# Altium PCB IT_SENSOR_PCB.PcbDoc (part 1 of 2)
Units mm, origin at the board's own origin, x right, y up, seen from the top; angles counter-clockwise.
Board outline 100 x 100 mm, 4 copper layers (Top Layer, GND, POWER, Bottom Layer), stack 1.576 mm thick; 106 components, 76 nets, 394 pads, 164 vias.
Unrouted connection lines stored in the file: 43.
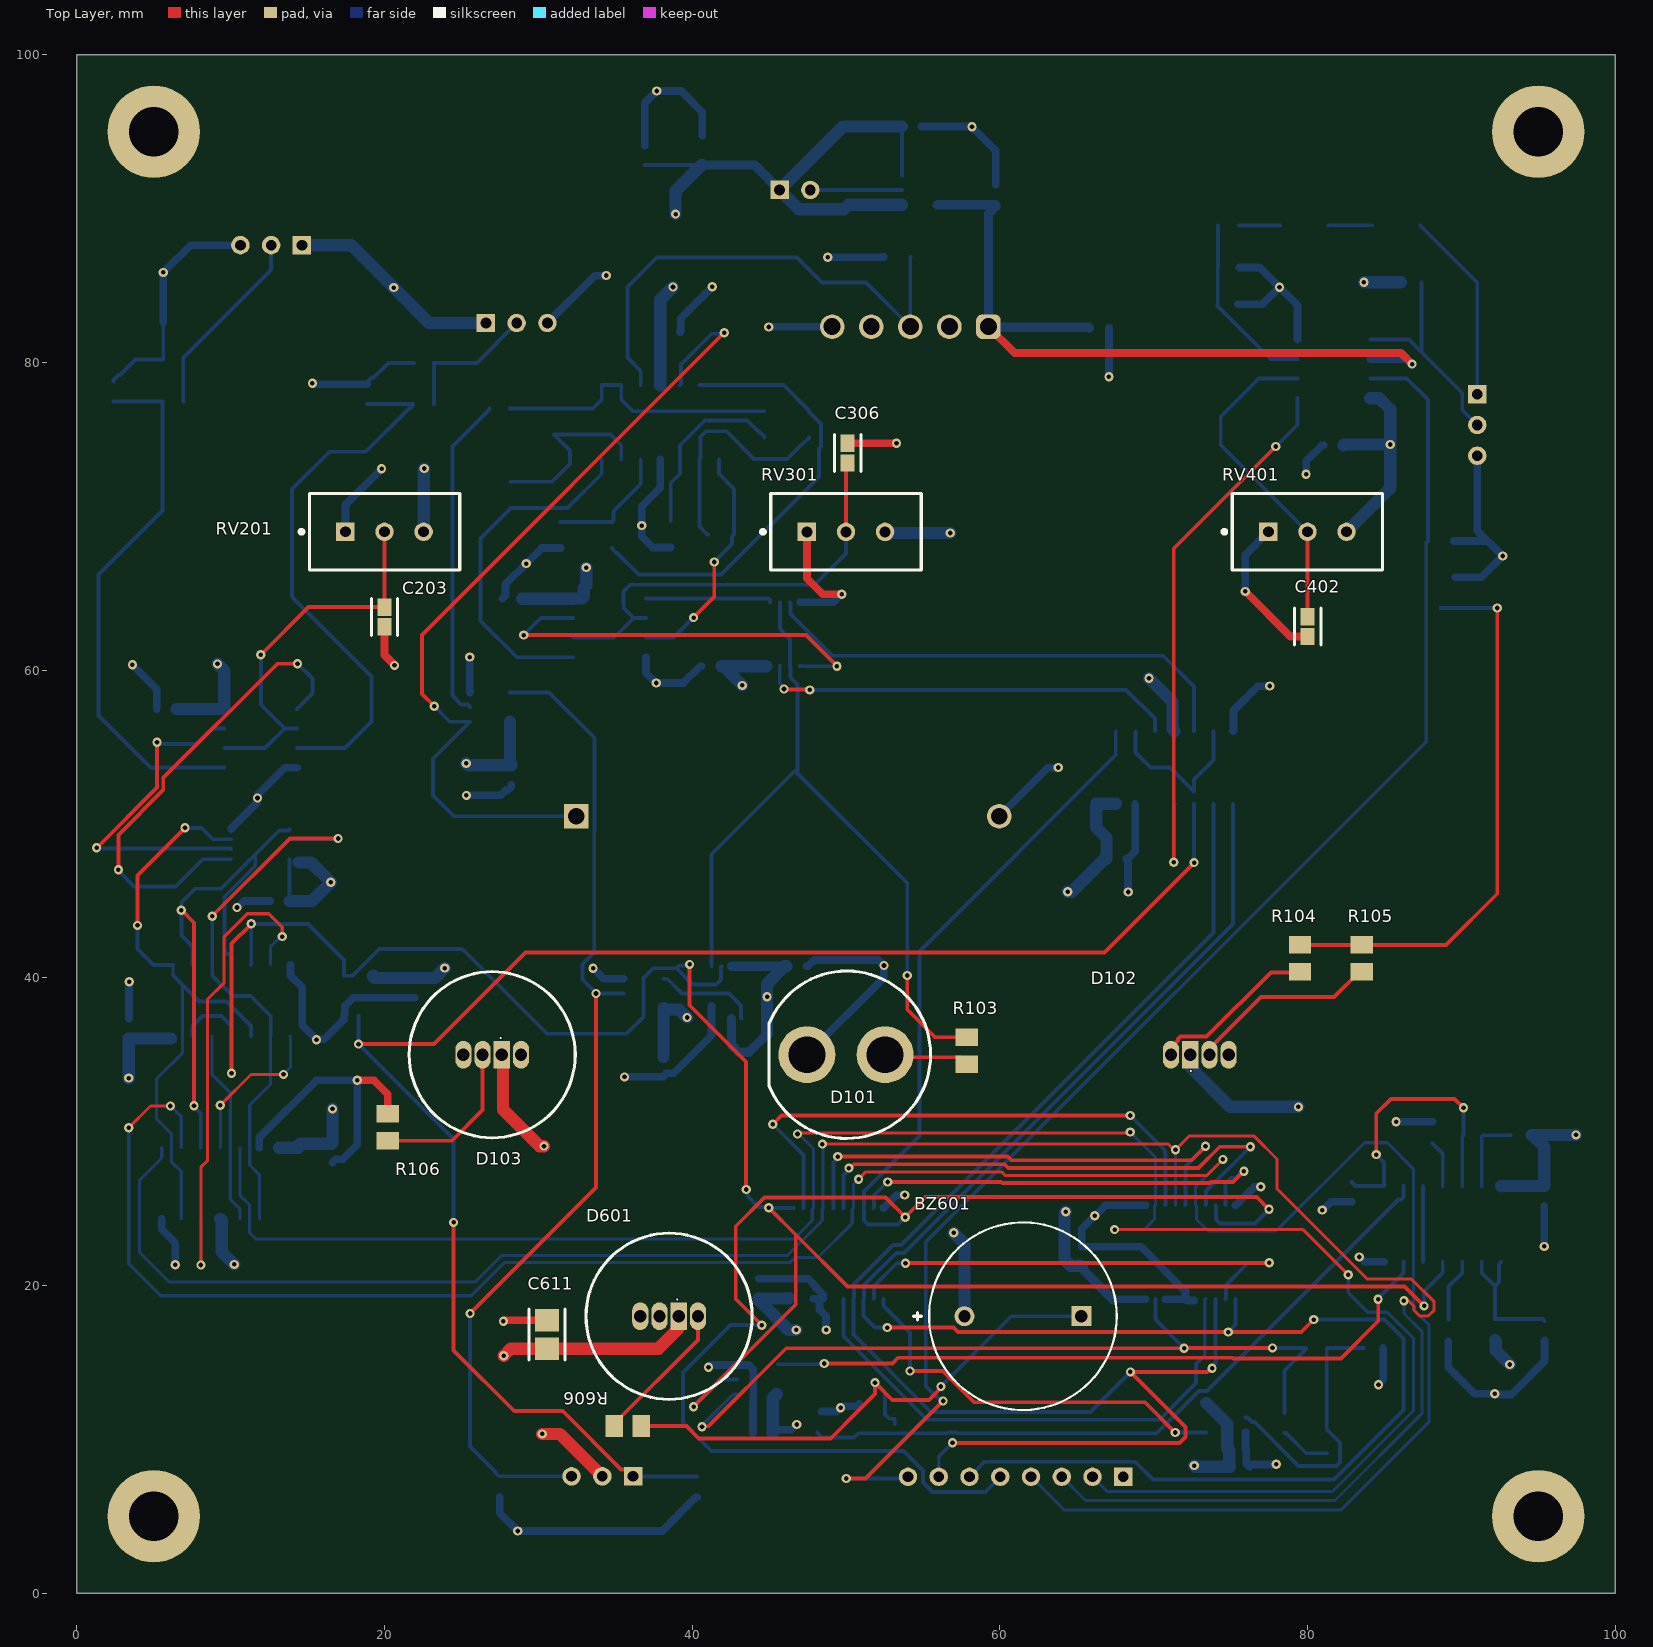
[diagram p0: Top Layer view]
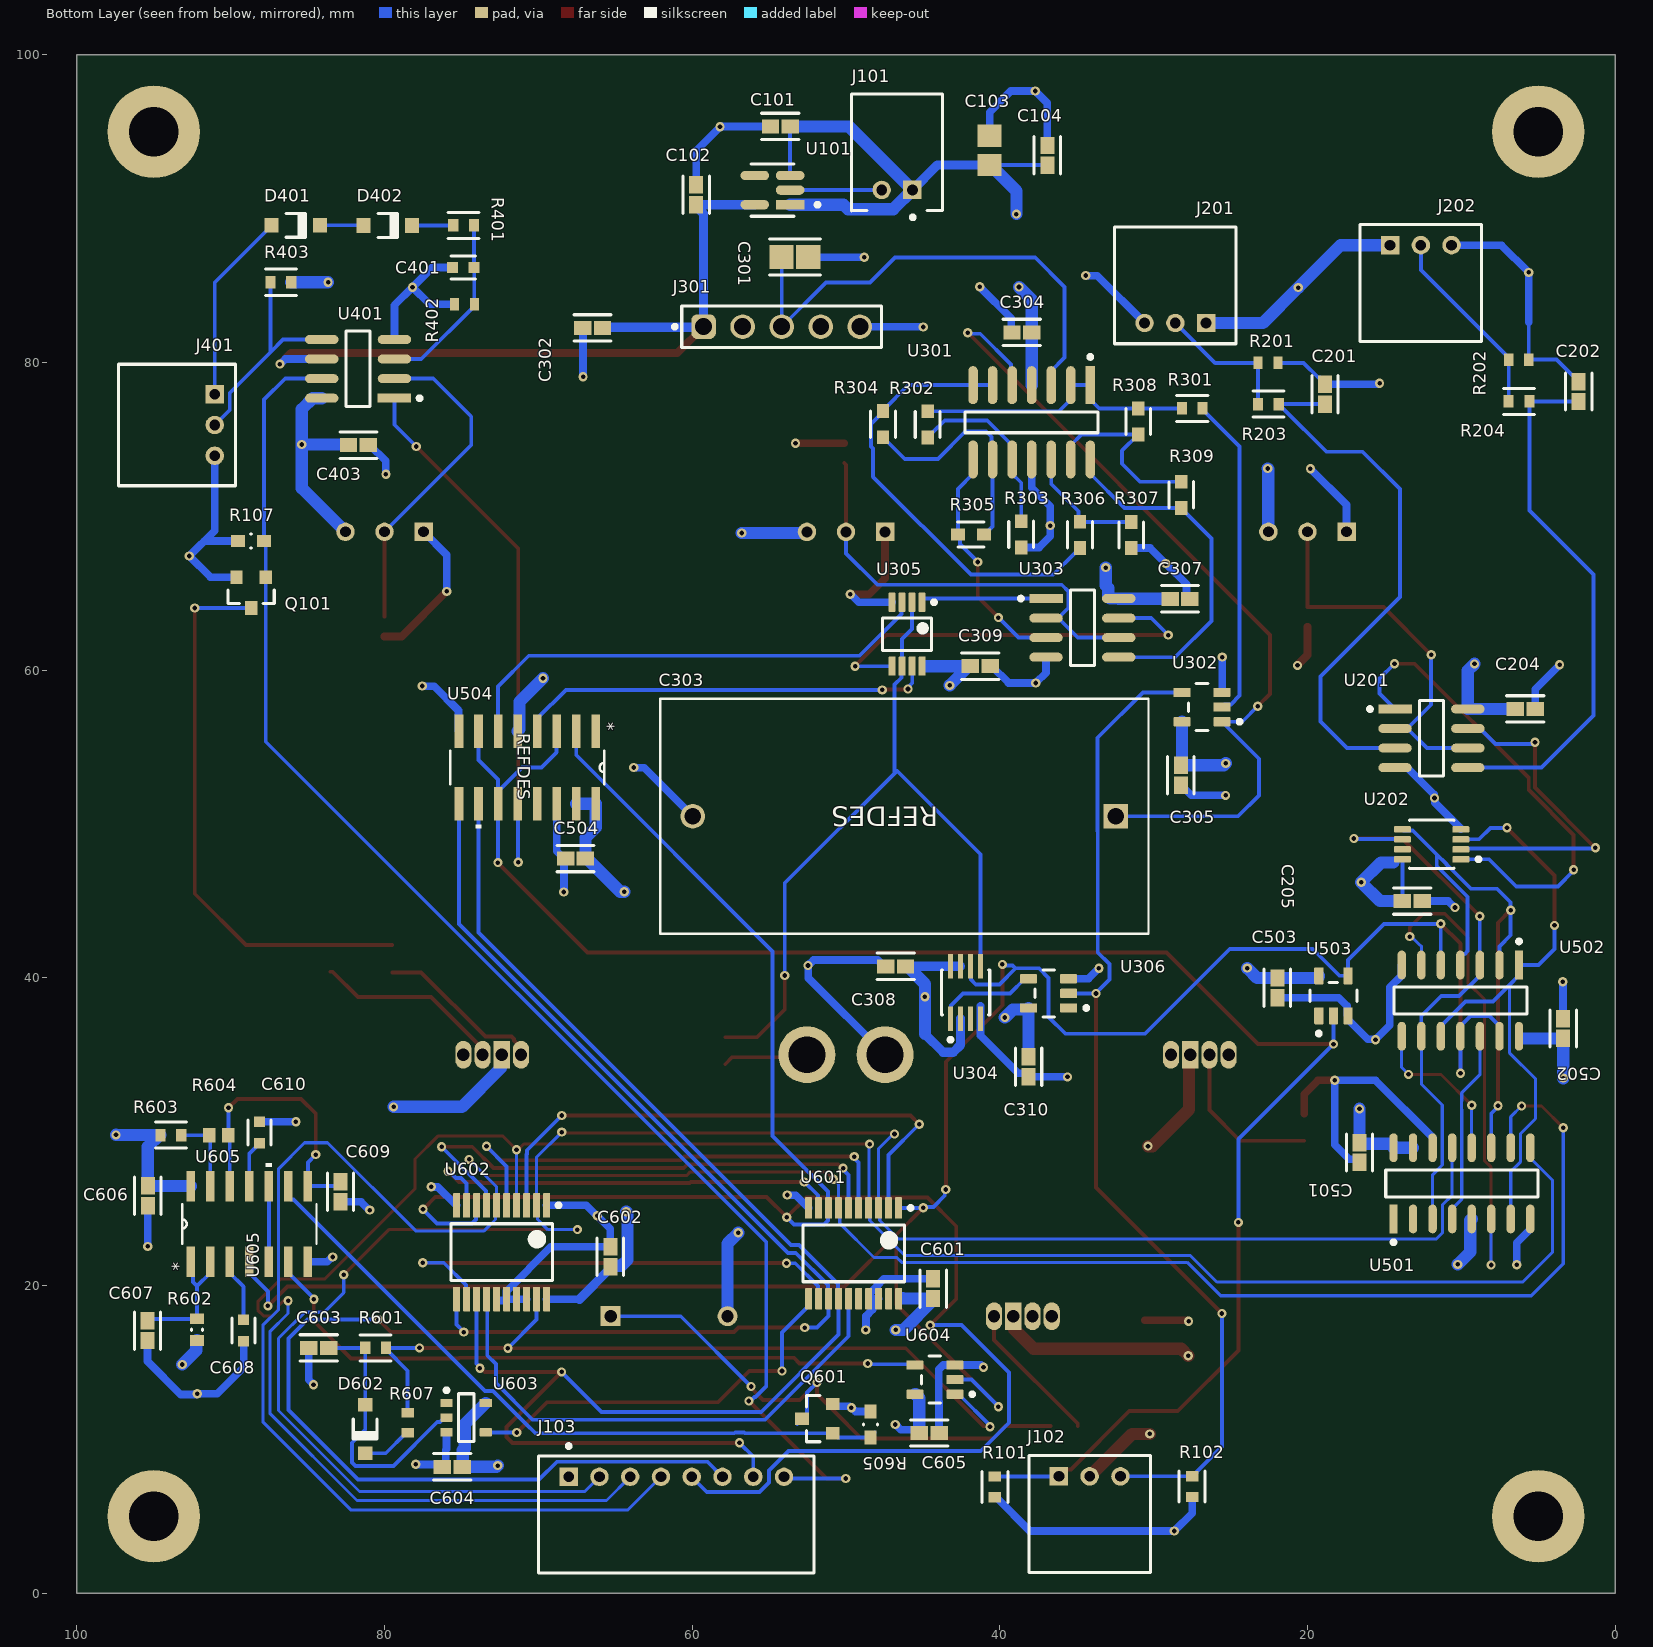
[diagram p1: Bottom Layer view, seen from below]
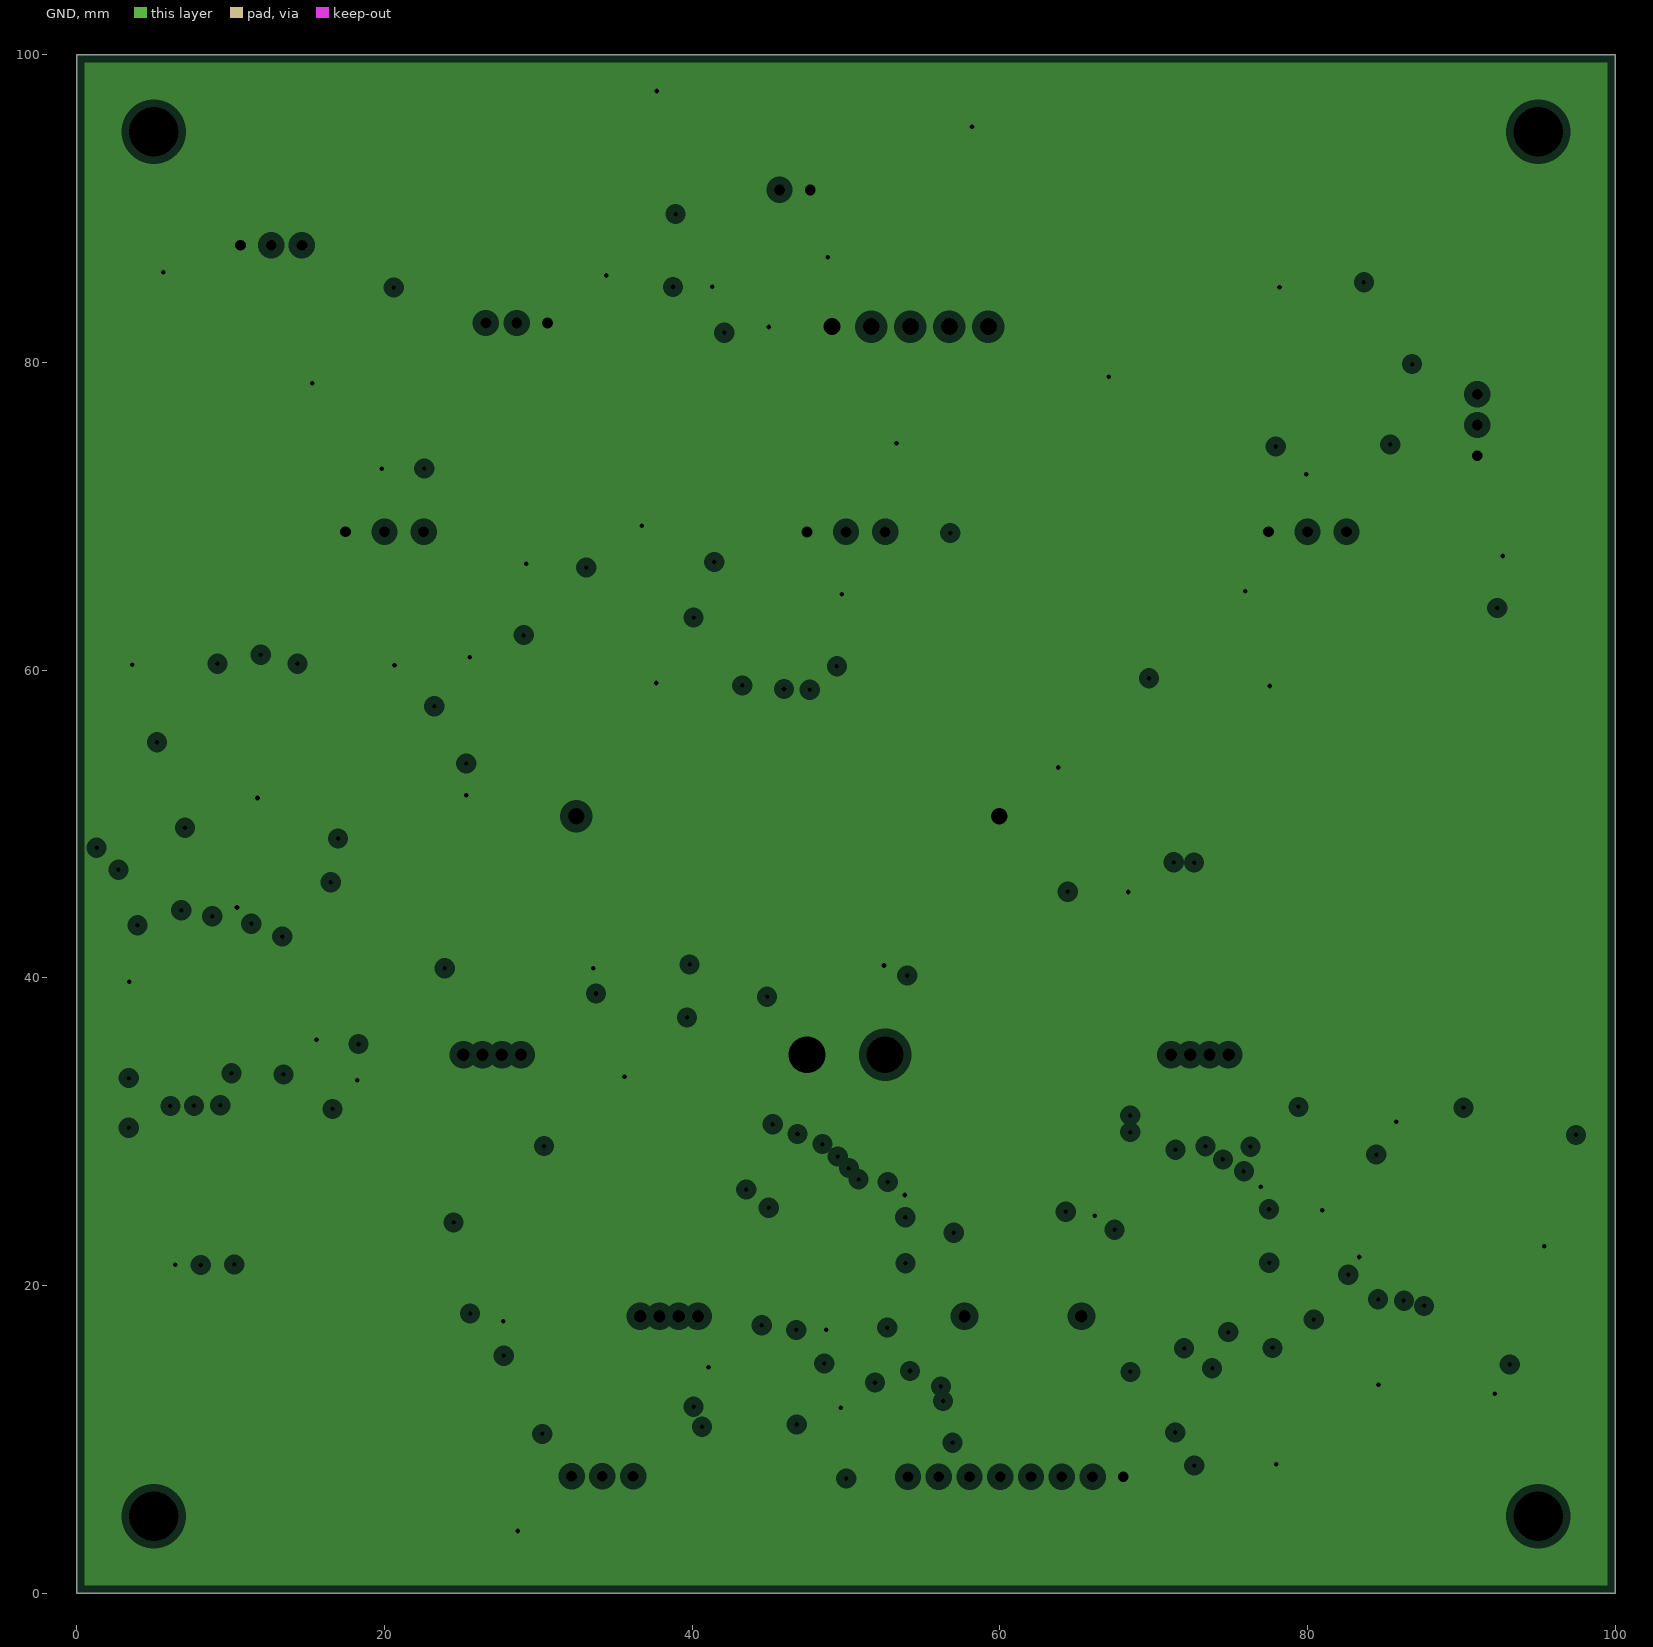
[diagram p2: GND, clearances drawn from the general rule]
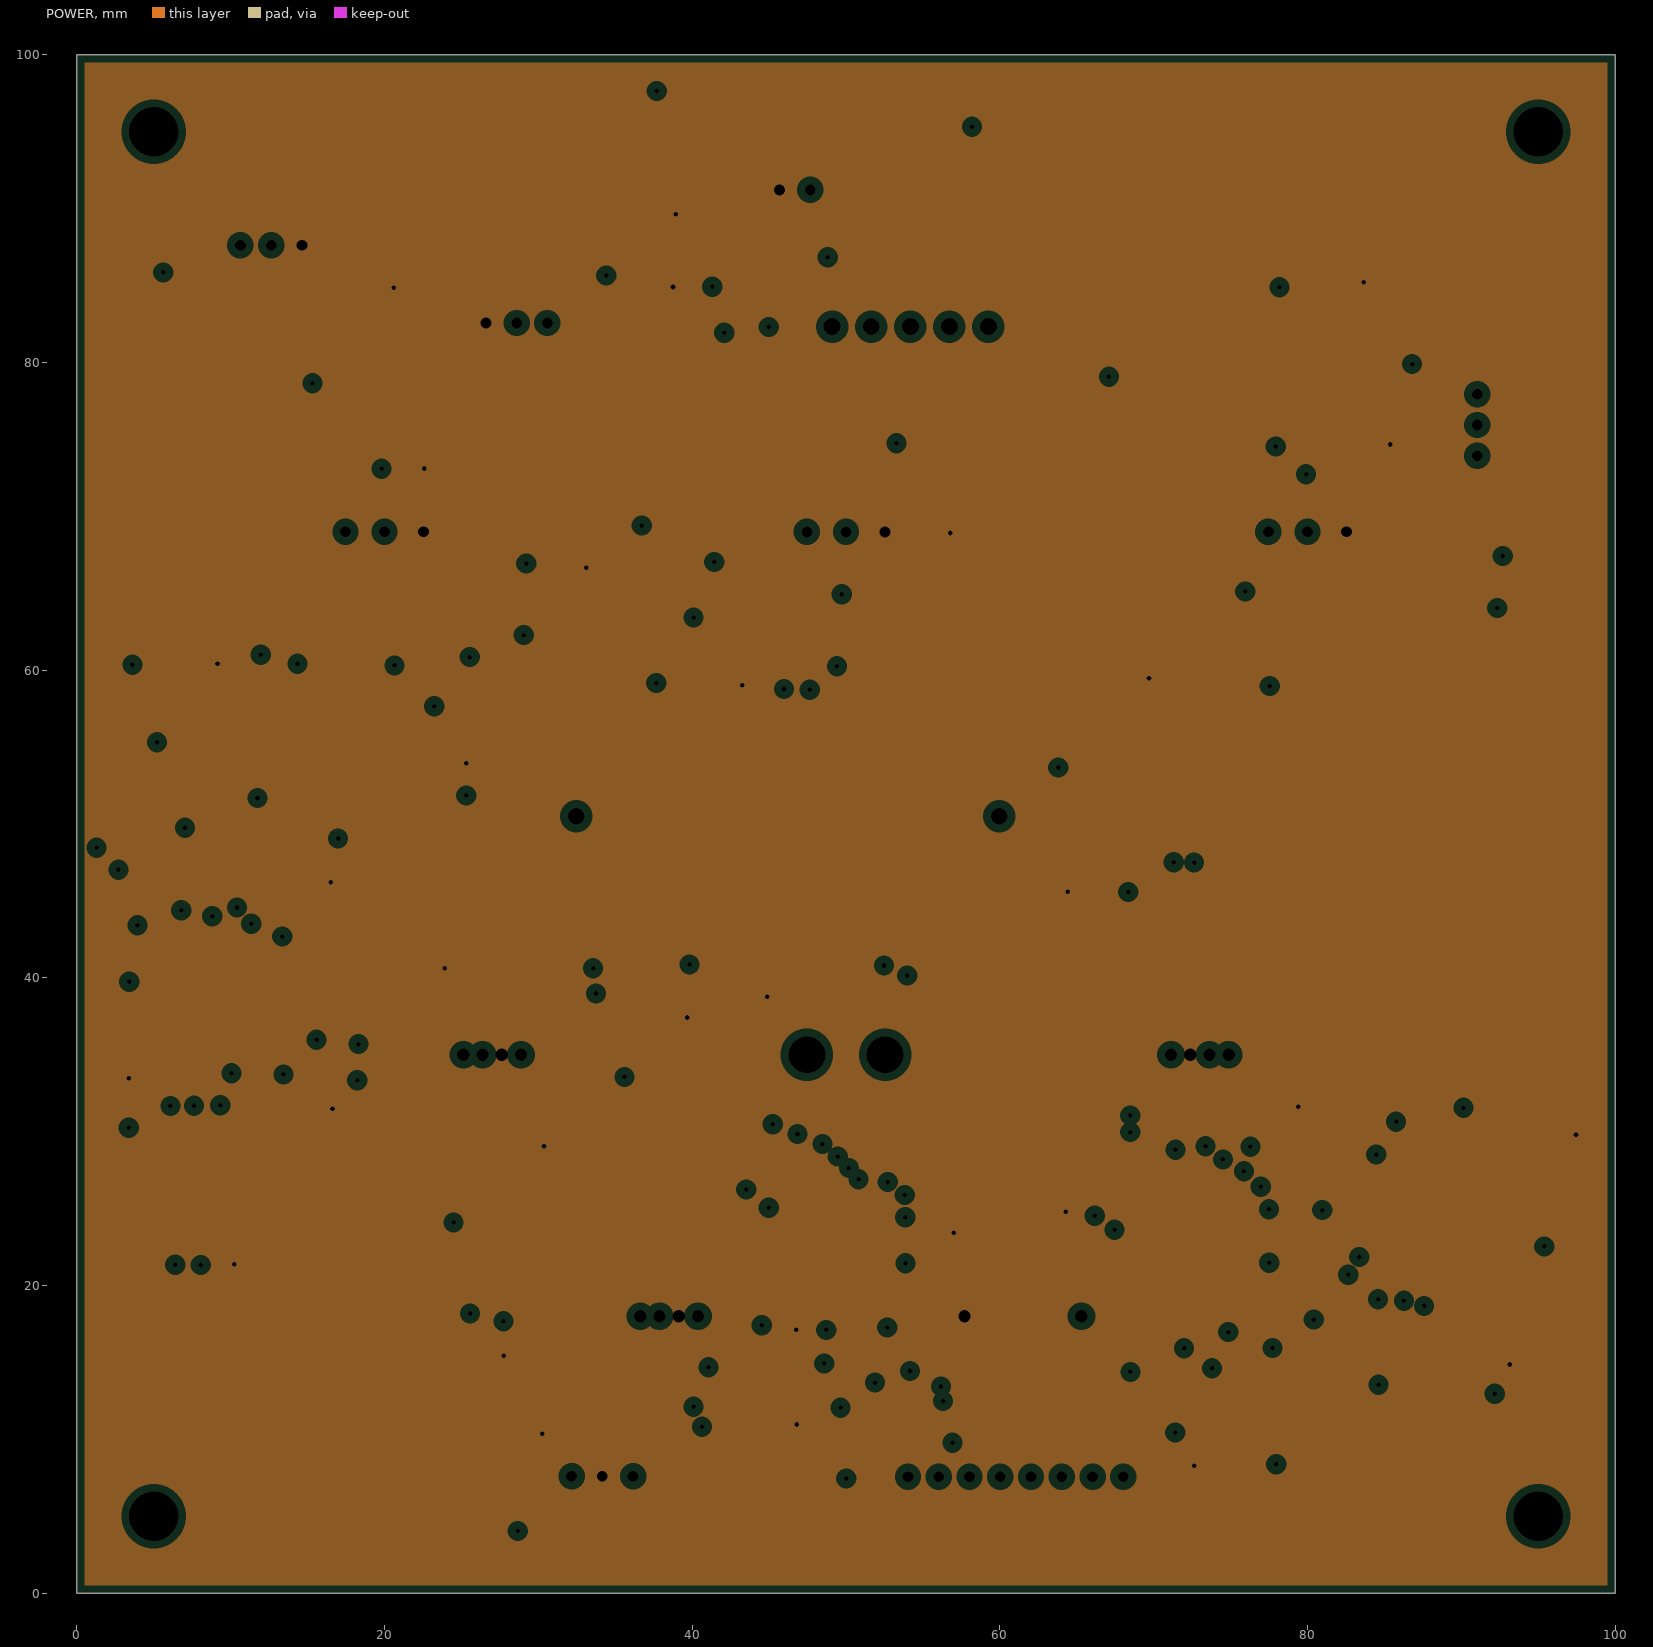
[diagram p3: POWER, clearances drawn from the general rule]
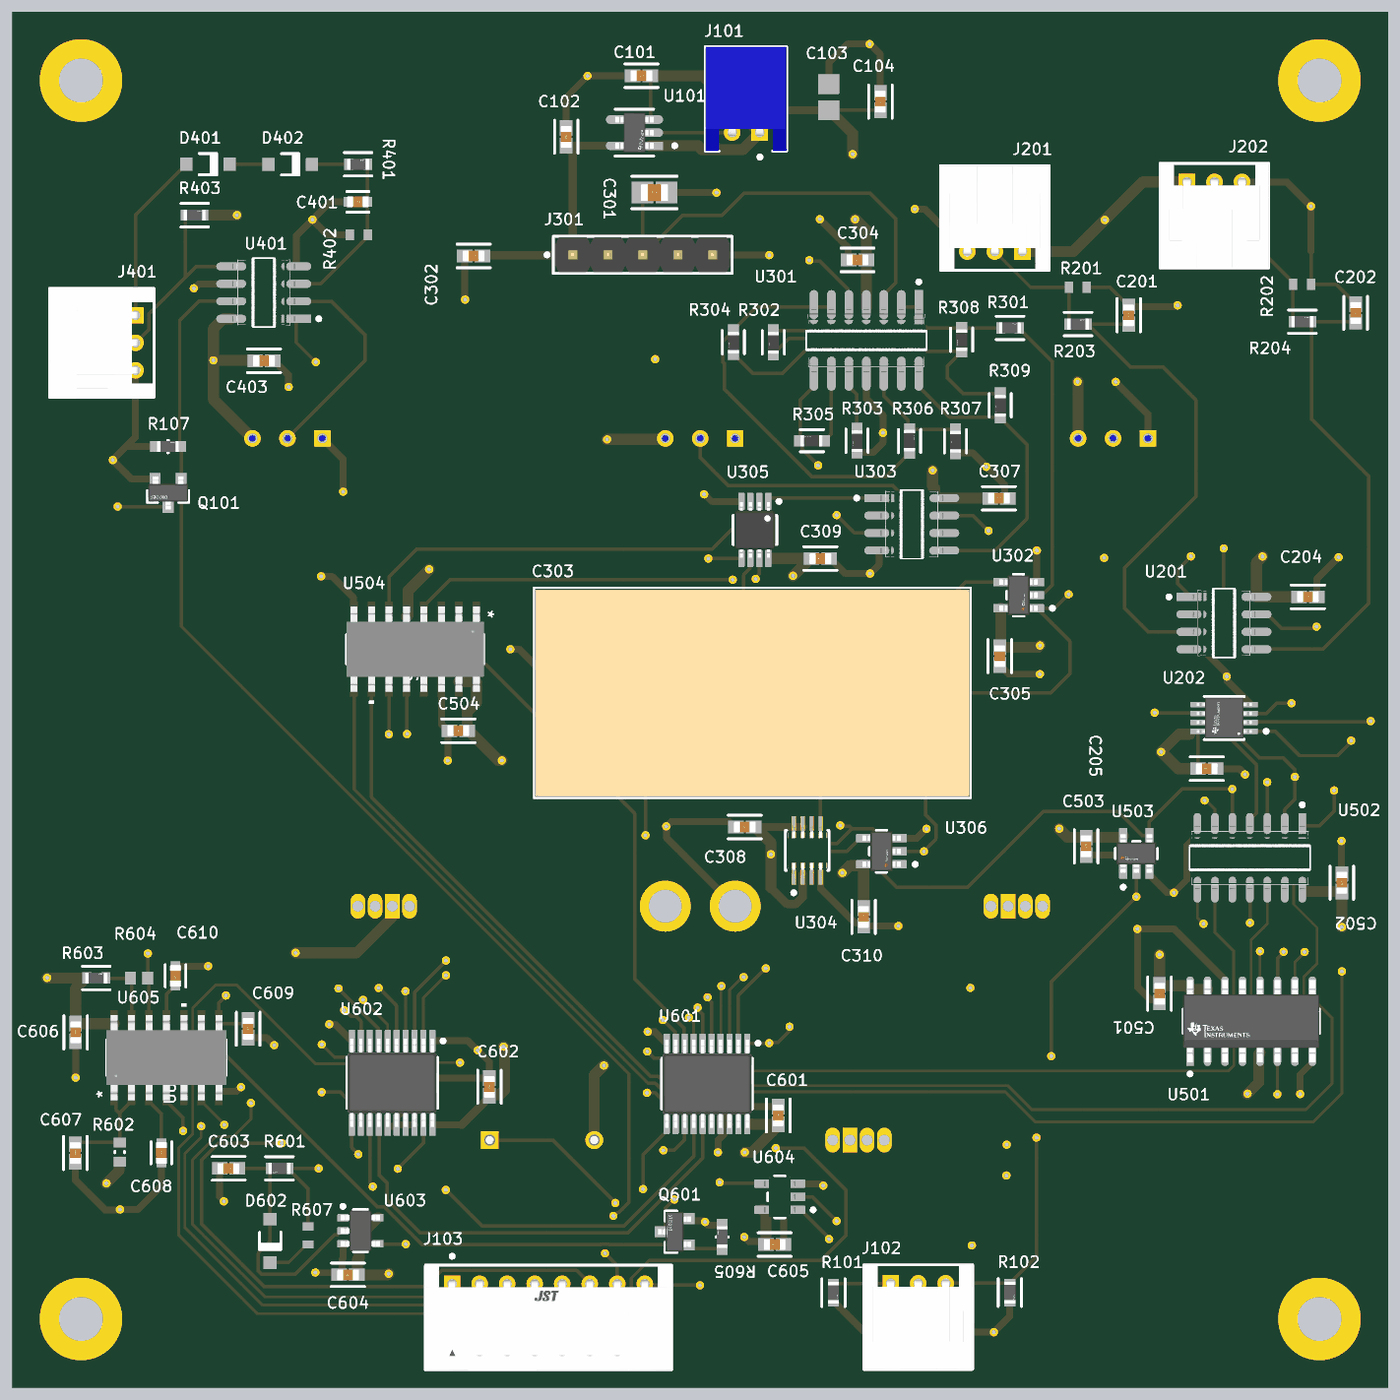
[diagram p5: 3D render of the assembled board from below, using the file's embedded part models]

## Layer stack, top to bottom
Top Solder: solder mask 0.0102, Solder Resist, Dk 3.5
Top Layer: signal copper 0.0356
Dielectric 2: prepreg 0.2, PP-006, Dk 4.1
GND: plane copper 0.0175, net GND
Dielectric 1: dielectric 1.07, FR-4, Dk 4.8
POWER: plane copper 0.0175, net +5V
Dielectric 3: prepreg 0.2, PP-006, Dk 4.1
Bottom Layer: signal copper 0.0356
Bottom Solder: solder mask 0.0102, Solder Resist, Dk 3.5

## Board outline
0,0 100,0 100,100 0,100

## Design rules (kind name [scope] priority, off if disabled: settings)
Clearance [All] p1: gap=0.15 ignorepadtopadclearanceinfootprint=FALSE
HoleSize [All] p1: absolutevalues=TRUE maxlimit=3.5 minlimit=0.025 maxpercent=80.000 minpercent=20.000
MinimumSolderMaskSliver [All] p1: minsoldermaskwidth=0.149
PlaneClearance [All] p1: clearance=0.508
PlaneConnect PlaneConnect_1 [IsPad And InNet('+5V') And (InComponent('D102') Or InComponent('D103') Or InComponent('D601'))] p1: pad.planeconnectstyle=Direct pad.reliefexpansion=0.508 pad.reliefentries=4 pad.reliefconductorwidth=0.254 pad.reliefairgap=0.254 via.planeconnectstyle=Relief via.reliefexpansion=0.508 via.reliefentries=4 via.reliefconductorwidth=0.254 via.reliefairgap=0.254
PlaneConnect [All] p2: planeconnectstyle=Relief reliefexpansion=0.508 reliefentries=2 reliefconductorwidth=0.254 reliefairgap=0.254
PolygonConnect [All] p1: connectstyle=Relief reliefconductorwidth=0.254 reliefentries=4 polygonreliefangle="90 Angle" airgapwidth=0.254
RoutingVias [All] p1: holewidth=0.3 width=0.6 viastyle="Through Hole" minholewidth=0.3 minwidth=0.6 maxholewidth=0.3 maxwidth=0.6
SilkToSolderMaskClearance [IsPad] p1: minsilkscreentomaskgap=0.15 clearancetoexposedcopper=TRUE
SolderMaskExpansion [All] p1: expansion=0 istentingtop=FALSE
SupplyNets "Schematic Supply Nets" [InNet('GND')] p1: voltage=0.000
Width [All] p1: maxlimit=1 minlimit=0.15 preferedwidth=0.25
25 further rules are at their usual default settings.

## Classes and differential pairs
component class 06_RISK_ALERT: BZ601 C601 C602 C603 C604 C605 C606 C607 C608 C609 C610 C611 D601 D602 Q601 R601 R602 R603 R604 R605 R606 R607 U601 U602 U603 U604 U605
component class 05_RISK_MEMORY: C501 C502 C503 C504 U501 U502 U503 U504
component class 04_VIBRATION_FAULT: C401 C402 C403 D401 D402 J401 R401 R402 R403 RV401 U401
component class 03_TILT_REF: C301 C302 C303 C304 C305 C306 C307 C308 C309 C310 J301 R301 R302 R303 R304 R305 R306 R307 R308 R309 RV301 U301 U302 U303 U304 U305 U306
component class 02_DISPLACEMENT: C201 C202 C203 C204 C205 J201 J202 R201 R202 R203 R204 RV201 U201 U202
component class 01_POWER_IO: C101 C102 C103 C104 D101 D102 D103 J101 J102 J103 Q101 R101 R102 R103 R104 R105 R106 R107 U101

## Components (designator, comment, footprint, x,y, rotation, side; value= is the part's Value field where it differs from the comment)
BZ601 "AI-1223-TWT-5V-R" FP-AI-1223-TWT-5V-R-MFG 61.5,18 r0 top
C101 "C1608X7R1C105K080AC" FP-C1608-080-0_1-IPC_B 54.27,95.35 r0 bottom
C102 "C1608X7R1C105K080AC" FP-C1608-080-0_1-IPC_B 59.74,90.91 r90 bottom
C103 "GRM21BR71A106KE51K" CAPC2013X140X45ML15T25 40.66,93.79 r270 bottom
C104 "C1608X7R1H104K080AA" FP-C1608-080-0_1-IPC_B 36.91,93.47 r90 bottom
C201 "C1608X7R1C105K080AC" FP-C1608-080-0_1-IPC_B 18.86,77.941 r90 bottom
C202 "C1608X7R1C105K080AC" FP-C1608-080-0_1-IPC_B 2.37,78.11 r90 bottom
C203 "C1608X7R1H104K080AA" FP-C1608-080-0_1-IPC_B 20,63.459 r270 top
C204 "C1608X7R1H104K080AA" FP-C1608-080-0_1-IPC_B 5.84,57.48 r180 bottom
C205 "C1608X7R1H104K080AA" FP-C1608-080-0_1-IPC_B 13.189,44.99 r180 bottom
C301 "C2012X7R1C475K125AB" FP-C2012-125-0_2-IPC_A 53.326,86.86 r180 bottom
C302 "C1608X7R1H104K080AA" FP-C1608-080-0_1-IPC_B 66.471,82.25 r0 bottom
C303 "B32774D4106K000" CAP_B32774D4106J000_TDK 32.46,50.5 r0 bottom
C304 "C1608X7R1H104K080AA" FP-C1608-080-0_1-IPC_B 38.57,81.96 r0 bottom
C305 "C1608X7R1H104K080AA" FP-C1608-080-0_1-IPC_B 28.23,53.17 r270 bottom
C306 "C1608X7R1H104K080AA" FP-C1608-080-0_1-IPC_B 50.11,74.109 r90 top
C307 "C1608X7R1H104K080AA" FP-C1608-080-0_1-IPC_B 28.29,64.64 r180 bottom
C308 "C1608X7R1H104K080AA" FP-C1608-080-0_1-IPC_B 46.77,40.75 r0 bottom
C309 "C1608X7R1H104K080AA" FP-C1608-080-0_1-IPC_B 41.27,60.26 r180 bottom
C310 "C1608X7R1H104K080AA" FP-C1608-080-0_1-IPC_B 38.13,34.22 r270 bottom
C401 "C1608X7R1H103K080AA" FP-C1608-080-0_1-MFG 74.88,86.18 r0 bottom
C402 "C1608X7R1H104K080AA" FP-C1608-080-0_1-IPC_B 80.01,62.829 r270 top
C403 "C1608X7R1H104K080AA" FP-C1608-080-0_1-IPC_B 81.7,74.63 r180 bottom
C501 "C1608X7R1H104K080AA" FP-C1608-080-0_1-IPC_B 16.62,28.639 r270 bottom
C502 "C1608X7R1H104K080AA" FP-C1608-080-0_1-IPC_B 3.377,36.7 r90 bottom
C503 "C1608X7R1H104K080AA" FP-C1608-080-0_1-IPC_B 21.96,39.35 r270 bottom
C504 "C1608X7R1H104K080AA" FP-C1608-080-0_1-IPC_B 67.58,47.75 r0 bottom
C601 "C1608X7R1H104K080AA" FP-C1608-080-0_1-IPC_B 44.334,19.79 r90 bottom
C602 "C1608X7R1H104K080AA" FP-C1608-080-0_1-IPC_B 65.32,21.87 r90 bottom
C603 "C1608X7R1H104K080AA" FP-C1608-080-0_1-IPC_B 84.279,15.94 r0 bottom
C604 "C1608X7R1H104K080AA" FP-C1608-080-0_1-IPC_B 75.601,8.21 r0 bottom
C605 "C1608X7R1H104K080AA" FP-C1608-080-0_1-IPC_B 44.59,10.41 r180 bottom
C606 "C1608X7R1H104K080AA" FP-C1608-080-0_1-IPC_B 95.39,25.829 r270 bottom
C607 "C1608X7R1C105K080AC" FP-C1608-080-0_1-IPC_B 95.41,17.06 r270 bottom
C608 "C1608X7R1H103K080AA" FP-C1608-080-0_1-MFG 89.16,17.07 r270 bottom
C609 "C1608X7R1C105K080AC" FP-C1608-080-0_1-IPC_B 82.86,26.089 r270 bottom
C610 "C1608X7R1H103K080AA" FP-C1608-080-0_1-MFG 88.13,29.94 r90 bottom
C611 "CL21A106KAYNNNE" FP-CL21-IPC_A 30.56,16.82 r90 top
D101 "COM-08860" LED_10MM_COM-08860 50,35 r0 top
D102 "LED_RGB_10MM_FD-10WRGB-A" LED_THT_RGB_10MM_FD10WRGBA 73,35 r180 top
D103 "LED_RGB_10MM_FD-10WRGB-A" LED_THT_RGB_10MM_FD10WRGBA 27,35 r0 top
D401 "1N4148W-7-F" DIOD-SOD123-2_V 85.78,88.92 r180 bottom
D402 "1N4148W-7-F" DIOD-SOD123-2_V 79.795,88.91 r180 bottom
D601 "LED_RGB_10MM_FD-10WRGB-A" LED_THT_RGB_10MM_FD10WRGBA 38.5,18 r0 top
D602 "1N4148W-7-F" DIOD-SOD123-2_V 81.26,10.67 r270 bottom
J101 "S2B-PH-K-S(LF)(SN)" JST-S2B-PH-K-S_V 46.68,93.67 r0 bottom
J102 "S3B-PH-K-S(LF)(SN)" FP-S3B-PH-K-S_LF_SN-MFG 34.16,5.14 r0 bottom
J103 "S8B-PH-K-S(LF)(SN)" FP-S8B-PH-K-S_LF_SN-MFG 61.03,5.11 r0 bottom
J201 "S3B-PH-K-S(LF)(SN)" FP-S3B-PH-K-S_LF_SN-MFG 28.59,85.02 r180 bottom
J202 "S3B-PH-K-S(LF)(SN)" FP-S3B-PH-K-S_LF_SN-MFG 12.63,85.18 r0 bottom
J301 "61300511121" 61300511121 54.18,82.33 r180 bottom
J401 "S3B-PH-K-S(LF)(SN)" FP-S3B-PH-K-S_LF_SN-MFG 93.49,75.94 r90 bottom
Q101 "BSS138-7-F" FP-SOT23_Standard-MFG 88.67,65.04 r270 bottom
Q601 "BSS138-7-F" FP-SOT23_Standard-MFG 51.86,11.34 r0 bottom
R101 "RC0603FR-0710KL" FP-RC0603-0_55-IPC_C 40.32,6.91 r270 bottom
R102 "RC0603FR-0710KL" FP-RC0603-0_55-IPC_C 27.5,6.92 r270 bottom
R103 "ERJ6ENF2200V" RESC2013X70X40NL20T20 57.85,35.26 r270 top
R104 "ERJ6ENF2200V" RESC2013X70X40NL20T20 79.52,41.265 r270 top
R105 "ERJ6ENF2200V" RESC2013X70X40NL20T20 83.52,41.265 r90 top
R106 "ERJ6ENF2200V" RESC2013X70X40NL20T20 20.21,30.28 r90 top
R107 "RC0603FR-07100KL" FP-RC0603-0_55-MFG 88.68,68.4 r180 bottom
R201 "RC0603FR-071ML" RESC1608X55X25LL10T15 22.56,79.98 r180 bottom
R202 "RC0603FR-071ML" RESC1608X55X25LL10T15 6.26,80.19 r180 bottom
R203 "RC0603FR-0710KL" FP-RC0603-0_55-IPC_C 22.543,77.3 r180 bottom
R204 "RC0603FR-0710KL" FP-RC0603-0_55-IPC_C 6.243,77.47 r180 bottom
R301 "RC0603FR-071KL" FP-RC0603-0_55-IPC_C 27.49,77.02 r180 bottom
R302 "RT0603BRD0710KL" FP-RT0603-MFG 44.69,75.98 r270 bottom value=10KΩ
R303 "RT0603BRD07100KL" FP-RT0603-MFG 38.61,68.83 r270 bottom value=100KΩ
R304 "RT0603BRD0710KL" FP-RT0603-MFG 47.59,75.99 r270 bottom value=10KΩ
R305 "RT0603BRD07100KL" FP-RT0603-MFG 41.88,68.82 r0 bottom value=100KΩ
R306 "RT0603BRD0710KL" FP-RT0603-MFG 34.79,68.8 r90 bottom value=10KΩ
R307 "RT0603BRD07100KL" FP-RT0603-MFG 31.45,68.79 r270 bottom value=100KΩ
R308 "RT0603BRD0710KL" FP-RT0603-MFG 31,76.17 r270 bottom value=10KΩ
R309 "RT0603BRD07100KL" FP-RT0603-MFG 28.2,71.4 r270 bottom value=100KΩ
R401 "RC0603FR-0710KL" FP-RC0603-0_55-IPC_C 74.86,88.91 r180 bottom
R402 "RC0603FR-071ML" RESC1608X55X25LL10T15 74.81,83.78 r0 bottom
R403 "RC0603FR-0710KL" FP-RC0603-0_55-IPC_C 86.743,85.22 r180 bottom
R601 "RC0603FR-0710KL" FP-RC0603-0_55-IPC_C 80.58,15.94 r0 bottom
R602 "2M7 1% 0603(1608)" RESC0603(1608)_L 92.19,17.13 r90 bottom value="2700000.00 Ohm"
R603 "RC0603FR-0710KL" FP-RC0603-0_55-IPC_C 93.89,29.78 r180 bottom
R604 "CRCW0603715KFKEA" RESC1609X50X30NL10T20 90.78,29.77 r0 bottom
R605 "RC0603FR-07100KL" FP-RC0603-0_55-MFG 48.41,10.96 r90 bottom
R606 "ERJ6ENF2200V" RESC2013X70X40NL20T20 35.81,10.87 r0 top
R607 "RC0603FR-072K2L" RESC1608X55X25LL10T15 78.5,11.07 r90 bottom
RV201 "3296W-1-103LF" FP-3296W-MFG 20,69 r270 top
RV301 "3296W-1-103LF" FP-3296W-MFG 50,68.995 r270 top
RV401 "3296W-1-103LF" FP-3296W-MFG 80,69 r270 top
U101 "TLV70033DDCR" FP-DDC0005A-IPC_A 54.78,91.21 r0 bottom
U201 "TLV3202AIDR" FP-D0008A-IPC_B 11.94,55.57 r180 bottom
U202 "SN74LVC1G139DCTR" FP-DCT0008A-MFG#1 11.93,48.68 r0 bottom
U301 "OPA4196IDR" FP-D0014A-IPC_A 37.93,76.114 r270 bottom
U302 "TMUX1101DBVR" FP-DBV0005A-MFG 26.86,57.6 r0 bottom
U303 "TLV3202AIDR" FP-D0008A-IPC_B 34.63,62.75 r180 bottom
U304 "SN74LVC1G74DCTR" FP-DCT0008A-MFG#2 42.23,39.05 r90 bottom
U305 "SN74LVC2G08DCTR" DCT0008A_M 46.03,62.34 r270 bottom
U306 "SN74LVC1G04DBVR" FP-DBV0005A-MFG 36.83,38.99 r0 bottom
U401 "TLV3202AIDR" FP-D0008A-IPC_B 81.72,79.59 r0 bottom
U501 "CD4044BDR" FP-D0016A-IPC_C 9.96,26.64 r90 bottom
U502 "SN74HC11DR" FP-D0014A-IPC_C 10.06,38.516 r270 bottom
U503 "SN74LVC1G04DBVR" FP-DBV0005A-MFG 18.31,38.83 r90 bottom
U504 "CD4043BDR" D16 70.715,53.672 r270 bottom
U601 "SN74HC273PWR" PW0020A_N 49.504,22.09 r270 bottom
U602 "SN74HC688PWR" PW0020A_M 72.39,22.16 r270 bottom
U603 "SN74LVC1G17DBVR" DBV0005A_L 74.695,11.41 r180 bottom
U604 "SN74LVC1G00DBVR" FP-DBV0005A-MFG 44.22,13.88 r0 bottom
U605 "TLC556IDR" D14 88.79,23.996 r90 bottom

## Footprints (in the part's own frame and the unit in brackets; to place one, negate y for a bottom-side part, rotate by r counter-clockwise, add the part's x,y. Pads: shape width x height; smd on the part's side, far side on the other; paste and mask are expansions set on the pad)
61300511121 [mm] "Pin Header, pitch 2.54 mm, THT, Vertical, single row, 5p"
  rrect50% 1.6x1.6 hole 1.1: 1(-5.08,0)
  round 1.6 hole 1.1: 2(-2.54,0) 3(0,0) 4(2.54,0) 5(5.08,0)
  silkscreen extent -7.07,-1.35 6.5,1.35, body extent -6.35,-1.27 6.35,1.27, height 8.57
CAP_B32774D4106J000_TDK [mil]
  rect 63x63 / inner round 60 / far side rect 63x63 hole 43 paste-99999 mask+0: 1(0,0)
  round 63 / inner round 60 / far side round 63 hole 43 paste-99999 mask+0: 2(1082.68,0)
  silkscreen extent -84,-300 1166,300, body extent -79,-296 1161,296, height 965
CAPC2013X140X45ML15T25 [mm] "Chip Capacitor, 2-Leads, Body 2.00x1.25mm, IPC Low Density"
  rect 1.45x1.55 smd: 1(-0.95,0) 2(0.95,0)
  body extent -1.08,-0.7 1.07,0.7, height 1.4
D14 [mil]
  rect 78x22 smd paste-39 mask-39: 1(-97,150) 2(-97,100) 3(-97,50) 4(-97,0) 5(-97,-50) 6(-97,-100) 7(-97,-150) 8(97,-150) 9(97,-100) 10(97,-50) 11(97,0) 12(97,50) 13(97,100) 14(97,150)
  silkscreen extent -51,-172 156,172, body extent -122,-172 122,172, height 69
D16 [mil]
  rect 86x22 smd paste-43 mask-43: 1(-93,175) 2(-93,125) 3(-93,75) 4(-93,25) 5(-93,-25) 6(-93,-75) 7(-93,-125) 8(-93,-175) 9(93,-175) 10(93,-125) 11(93,-75) 12(93,-25) 13(93,25) 14(93,75) 15(93,125) 16(93,175)
  silkscreen extent -43,-197 156,197, body extent -122,-197 122,197, height 69
DBV0005A_L [mm] "SOT23, 5-Leads, Body 3.05x1.75mm, Pitch 0.95mm, IPC High Density"
  rrect18% 0.8x0.55 smd: 1(-1.275,0.95) 2(-1.275,0) 3(-1.275,-0.95) 4(1.275,-0.95) 5(1.275,0.95)
  silkscreen extent -1.4,-1.55 0.5,1.9, body extent -1.42,-1.46 1.42,1.46, height 1.08
DCT0008A_M [mm] "SOP, 8-Leads, Body 2.9x3.2mm, Pitch 0.65mm, IPC Low Density"
  rrect22% 1.25x0.45 smd: 1(-2.075,0.975) 2(-2.075,0.325) 3(-2.075,-0.325) 4(-2.075,-0.975) 5(2.075,-0.975) 6(2.075,-0.325) 7(2.075,0.325) 8(2.075,0.975)
  silkscreen extent -2.2,-1.6 1.05,1.87, body extent -2.01,-1.47 2.01,1.48, height 1.3
DIOD-SOD123-2_V [mm] "SOD123, 2-Leads, Body 2.7x1.55mm, Height 1.45mm"
  rect 0.9x0.95 smd: 1(-1.575,0) 2(1.575,0)
  silkscreen extent -0.64,-0.82 0.64,0.77, body extent -1.35,-0.77 1.35,0.77, height 1.45
FP-3296W-MFG [mm]
  rect 1.2x1.2 hole 0.7 paste-2539.97 mask+0: 1(0.005,-2.54)
  round 1.2 hole 0.7 paste-2539.97 mask+0: 2(0.005,0) 3(0.005,2.54)
  silkscreen extent -2.48,-5.52 2.48,4.89, body extent -2.58,-4.99 2.58,4.99, height 0.25
FP-AI-1223-TWT-5V-R-MFG [mm]
  rect 1.3x1.3 hole 0.8 paste-2539.97 mask+0: 1(3.8,0)
  round 1.3 hole 0.8 paste-2539.97 mask+0: 2(-3.8,0)
  silkscreen extent -7.1,-6.1 6.1,6.1, body extent -6.2,-6.2 6.2,6.2, height 0.25
FP-C1608-080-0_1-IPC_B [mm]
  rect 1.131x0.912 smd paste+0 mask+0: 1(-0.641,0) 2(0.641,0)
  silkscreen extent -1.21,-0.86 1.21,0.86, body extent -0.8,-0.4 0.8,0.4, height 0.9
FP-C1608-080-0_1-MFG [mm]
  rect 0.7x0.7 smd paste+0 mask+0: 1(-0.7,0) 2(0.7,0)
  silkscreen extent -0.8,-0.75 0.8,0.75, body extent -0.8,-0.4 0.8,0.4, height 0.9
FP-C2012-125-0_2-IPC_A [mm]
  rect 1.578x1.556 smd paste+0 mask+0: 1(-0.864,0) 2(0.864,0)
  silkscreen extent -1.65,-1.18 1.65,1.18, body extent -1,-0.63 1,0.63, height 1.45
FP-CL21-IPC_A [mm]
  rect 1.455x1.556 smd paste+0 mask+0: 1(-0.926,0) 2(0.926,0)
  silkscreen extent -1.65,-1.18 1.65,1.18, body extent -2.15,-1.28 2.15,1.28, height 0.25
FP-D0008A-IPC_B [mm]
  rect 2.169x0.582 smd paste+0 mask+0: 1(-2.364,1.905)
  rrect100% 2.169x0.582 smd paste+0 mask+0: 2(-2.364,0.635) 3(-2.364,-0.635) 4(-2.364,-1.905) 5(2.364,-1.905) 6(2.364,-0.635) 7(2.364,0.635) 8(2.364,1.905)
  silkscreen extent -4.12,-2.45 0.78,2.45, body extent -3,-2.45 3,2.45, height 1.75
FP-D0014A-IPC_A [mm]
  rect 2.474x0.622 smd paste+0 mask+0: 1(-2.416,3.81)
  rrect100% 2.474x0.622 smd paste+0 mask+0: 2(-2.416,2.54) 3(-2.416,1.27) 4(-2.416,0) 5(-2.416,-1.27) 6(-2.416,-2.54) 7(-2.416,-3.81) 8(2.416,-3.81) 9(2.416,-2.54) 10(2.416,-1.27) 11(2.416,0) 12(2.416,1.27) 13(2.416,2.54) 14(2.416,3.81)
  silkscreen extent -4.37,-4.33 0.68,4.33, body extent -3,-4.33 3,4.33, height 1.75
FP-D0014A-IPC_C [mm]
  rect 1.874x0.542 smd paste+0 mask+0: 1(-2.316,3.81)
  rrect100% 1.874x0.542 smd paste+0 mask+0: 2(-2.316,2.54) 3(-2.316,1.27) 4(-2.316,0) 5(-2.316,-1.27) 6(-2.316,-2.54) 7(-2.316,-3.81) 8(2.316,-3.81) 9(2.316,-2.54) 10(2.316,-1.27) 11(2.316,0) 12(2.316,1.27) 13(2.316,2.54) 14(2.316,3.81)
  silkscreen extent -3.97,-4.33 0.88,4.33, body extent -3,-4.33 3,4.33, height 1.75
FP-D0016A-IPC_C [mm]
  rect 1.874x0.542 smd paste+0 mask+0: 1(-2.316,4.445)
  rrect100% 1.874x0.542 smd paste+0 mask+0: 2(-2.316,3.175) 3(-2.316,1.905) 4(-2.316,0.635) 5(-2.316,-0.635) 6(-2.316,-1.905) 7(-2.316,-3.175) 8(-2.316,-4.445) 9(2.316,-4.445) 10(2.316,-3.175) 11(2.316,-1.905) 12(2.316,-0.635) 13(2.316,0.635) 14(2.316,1.905) 15(2.316,3.175) 16(2.316,4.445)
  silkscreen extent -3.95,-4.95 0.88,4.95, body extent -3,-4.95 3,4.95, height 1.75
FP-DBV0005A-MFG [mm]
  rrect17% 1.1x0.6 smd paste+0 mask+0: 1(-1.3,0.95) 2(-1.3,0) 3(-1.3,-0.95) 4(1.3,-0.95) 5(1.3,0.95)
  silkscreen extent -2.57,-1.53 0.87,1.53, body extent -1.4,-1.45 1.4,1.45, height 1.45
FP-DCT0008A-MFG#1 [mm]
  rrect25% 1.1x0.4 smd paste+0 mask+0: 1(-1.9,0.975) 2(-1.9,0.325) 3(-1.9,-0.325) 4(-1.9,-0.975) 5(1.9,-0.975) 6(1.9,-0.325) 7(1.9,0.325) 8(1.9,0.975)
  silkscreen extent -3.18,-1.58 1.45,1.58, body extent -2.02,-1.47 1.98,1.48, height 1.3
FP-DCT0008A-MFG#2 [mm]
  rect 1.6x0.3 smd paste-1000 mask+0: 1(-1.7,0.975) 2(-1.7,0.325) 3(-1.7,-0.325) 4(-1.7,-0.975) 5(1.7,-0.975) 6(1.7,-0.325) 7(1.7,0.325) 8(1.7,0.975)
  silkscreen extent -3.2,-1.58 1.45,1.58, body extent -2,-1.5 2,1.5, height 1.3
FP-DDC0005A-IPC_A [mm]
  rect 1.854x0.612 smd paste+0 mask+0: 1(-1.15,0.95)
  rrect100% 1.854x0.612 smd paste+0 mask+0: 2(-1.15,0) 3(-1.15,-0.95) 4(1.15,-0.95) 5(1.15,0.95)
  silkscreen extent -3.05,-1.7 1.4,1.7, body extent -1.4,-1.45 1.4,1.45, height 1.1
FP-RC0603-0_55-IPC_C [mm]
  rect 0.659x0.812 smd paste+0 mask+0: 1(-0.677,0) 2(0.677,0)
  silkscreen extent -1.01,-0.85 1.01,0.85, body extent -0.8,-0.4 0.8,0.4, height 0.55
FP-RC0603-0_55-MFG [mm]
  rect 0.9x0.8 smd paste+0 mask+0: 1(-0.85,0) 2(0.85,0)
  silkscreen extent -0.03,-0.45 0.03,0.45, body extent -0.8,-0.4 0.8,0.4, height 0.55
FP-RT0603-MFG [mm]
  rect 0.9x0.8 smd paste+0 mask+0: 1(-0.85,0) 2(0.85,0)
  silkscreen extent -0.85,-0.81 0.86,0.8, body extent -0.76,-0.4 0.84,0.4, height 0.58
FP-S3B-PH-K-S_LF_SN-MFG [mm]
  rect 1.2x1.2 hole 0.7 paste-2539.97 mask+0: 1(2,-2.45)
  round 1.2 hole 0.7 paste-2539.97 mask+0: 2(0,-2.45) 3(-2,-2.45)
  silkscreen extent -3.95,-3.8 3.95,3.8, body extent -3.95,-3.8 3.95,3.8, height 4.8
FP-S8B-PH-K-S_LF_SN-MFG [mm]
  rect 1.2x1.2 hole 0.7 paste-2539.97 mask+0: 1(7,-2.45)
  round 1.2 hole 0.7 paste-2539.97 mask+0: 2(5,-2.45) 3(3,-2.45) 4(1,-2.45) 5(-1,-2.45) 6(-3,-2.45) 7(-5,-2.45) 8(-7,-2.45)
  silkscreen extent -8.95,-4.57 8.95,3.8, body extent -8.95,-3.8 8.95,3.8, height 4.8
FP-SOT23_Standard-MFG [mm]
  rect 0.9x0.8 smd paste+0 mask+0: 1(-1,0.95) 2(-1,-0.95) 3(1,0)
  silkscreen extent -0.18,-1.5 0.7,1.5, body extent -1.2,-1.45 1.2,1.45, height 1.1
JST-S2B-PH-K-S_V [mm] "THD, 2-Leads, Body 7.6x5.9mm, Pitch 2mm"
  rect 1.2x1.2 hole 0.7: 1(-1,2.45)
  round 1.2 hole 0.7: 2(1,2.45)
  silkscreen extent -2.95,-3.8 2.95,4.35, body extent -2.95,-3.8 2.95,3.8, height 4.8
LED_10MM_COM-08860 [mm]
  round 3.7 hole 2.4: A(2.54,0) K(-2.54,0)
  silkscreen extent -5,-5.44 5.5,5.44
LED_THT_RGB_10MM_FD10WRGBA [mm]
  rect 1.05x1.8 hole 0.8: 1(0.625,0)
  oval 1.05x1.8 hole 0.8: 2(1.875,0) 3(-0.625,0) 4(-1.875,0)
PW0020A_M [mm] "SOP, 20-Leads, Body 6.6x4.5mm, Pitch 0.65mm, IPC Low Density"
  rrect22% 1.6x0.45 smd: 1(-3.05,2.925) 2(-3.05,2.275) 3(-3.05,1.625) 4(-3.05,0.975) 5(-3.05,0.325) 6(-3.05,-0.325) 7(-3.05,-0.975) 8(-3.05,-1.625) 9(-3.05,-2.275) 10(-3.05,-2.925) 11(3.05,-2.925) 12(3.05,-2.275) 13(3.05,-1.625) 14(3.05,-0.975) 15(3.05,-0.325) 16(3.05,0.325) 17(3.05,0.975) 18(3.05,1.625) 19(3.05,2.275) 20(3.05,2.925)
  silkscreen extent -3.17,-3.3 1.85,3.82, body extent -3.21,-3.25 3.21,3.25, height 1
PW0020A_N [mm] "SOP, 20-Leads, Body 6.6x4.5mm, Pitch 0.65mm, IPC Medium Density"
  rrect22% 1.4x0.45 smd: 1(-2.95,2.925) 2(-2.95,2.275) 3(-2.95,1.625) 4(-2.95,0.975) 5(-2.95,0.325) 6(-2.95,-0.325) 7(-2.95,-0.975) 8(-2.95,-1.625) 9(-2.95,-2.275) 10(-2.95,-2.925) 11(2.95,-2.925) 12(2.95,-2.275) 13(2.95,-1.625) 14(2.95,-0.975) 15(2.95,-0.325) 16(2.95,0.325) 17(2.95,0.975) 18(2.95,1.625) 19(2.95,2.275) 20(2.95,2.925)
  silkscreen extent -3.07,-3.3 1.85,3.82, body extent -3.21,-3.25 3.21,3.25, height 1
RESC0603(1608)_L [mm] "Chip Resistor, Body 1.6x0.8mm, IPC High Density"
  rect 0.7x0.9 smd: 1(-0.7,0) 2(0.7,0)
  silkscreen extent -0.05,-0.35 0.05,0.35, body extent -0.85,-0.47 0.85,0.47, height 0.6
RESC1608X55X25LL10T15 [mm] "Chip Resistor, 2-Leads, Body 1.70x0.90mm, IPC High Density"
  rect 0.6x0.8 smd: 1(-0.65,0) 2(0.65,0)
  body extent -0.85,-0.45 0.85,0.45, height 0.55
RESC1609X50X30NL10T20 [mm] "Chip Resistor, 2-Leads, Body 1.55x0.85mm, IPC Medium Density"
  rect 0.8x0.95 smd: 1(-0.625,0) 2(0.625,0)
  body extent -0.82,-0.48 0.82,0.48, height 0.5
RESC2013X70X40NL20T20 [mm] "Chip Resistor, 2-Leads, Body 2.00x1.25mm, IPC Medium Density"
  rect 1.15x1.45 smd: 1(-0.875,0) 2(0.875,0)
  body extent -1.1,-0.72 1.1,0.72, height 0.7

## Part data
BZ601: library part CMP-231724-000001-1, "3", Color=Black, Current Rating=30mA, Frequency=2.3kHz, Max Operating Temperature=85°C, Max Supply Voltage=7V, Min Operating Temperature=-40°C, Min Supply Voltage=3V, Nominal Supply Voltage (DC)=5V, Package Quantity=100, Bandwidth=2.3kHz, Contact Plating=Tin, Diameter=12mm, Height=9.5mm, Input Current=30mA, Input Type=DC, Lead Free="Lead Free", Length=12mm, Max Supply Current=30mA, Max Supply Voltage (DC)=7V, Min Supply Voltage (DC)=3V, Mount="Through Hole", Operating Supply Current=30mA, Packaging=Tray, REACH SVHC="No SVHC", Self Resonant Frequency=2.3kHz, Sensing Method=Magnetic, Series=AI, Termination="PC Pins", Voltage Rating (DC)=5V, Washable=Yes, Weight=0.01lb, Width=12mm
C101 C102 C201 C202 C607 C609: library part CMP-08246-002727-1, "Multilayer Ceramic Capacitors 1μF ±10% 16V X7R SMD 0603", Capacitance=1uF, Case Code (Imperial)=0603, Case Code (Metric)=1608, Dielectric=X7R, Dielectric Material=Ceramic, Max Operating Temperature=125°C, Min Operating Temperature=-55°C, Package Quantity=1, Tolerance=10%, Voltage=16V, Case/Package=0603, Construction=Flat, Depth=0.8mm, Height=0.8mm, Lead Free="Lead Free", Length=1.6mm, Mount="Surface Mount", Packaging="Tape and Reel", Radiation Hardening=No, REACH SVHC="No SVHC", Resistor Type=Ceramic, RoHS Compliant=Yes, Series=C, Termination=SMD/SMT, Thickness=0.037inch, Voltage Rating=16V, Voltage Rating (DC)=16V, Weight=7.1E-05oz, Width=0.031inch
C103: library part CMP-2007-03370-1, Manufacturer=Murata, Part Number=GRM21BR71A106KE51K
C104 C203 C204 C205 C302 C304 C305 C306 C307 C308 C309 C310 C402 C403 C501 C502 C503 C504 C601 C602 C603 C604 C605 C606: library part CMP-2000-04982-2, "Multilayer Ceramic Capacitors 100nF ±10% 50V X7R SMD 0603", Capacitance=100nF, Case Code (Imperial)=0603, Case Code (Metric)=1608, Dielectric=X7R, Dielectric Material=Ceramic, Max Operating Temperature=125°C, Min Operating Temperature=-55°C, Package Quantity=1, Tolerance=10%, Voltage=50V, Case/Package=0603, Construction=Flat, Depth=0.8mm, Height=0.8mm, Lead Free="Lead Free", Length=1.6mm, Mount="Surface Mount", Number of Pins=2, Packaging="Tape and Reel", Radiation Hardening=No, REACH SVHC="No SVHC", Resistor Type=Ceramic, RoHS Compliant=Yes, Series=C, Termination=SMD/SMT, Thickness=0.037inch, Voltage Rating=50V, Voltage Rating (DC)=50V, Weight=7.1E-05oz, Width=0.031inch
C301: library part CMP-08246-006097-1, "Multilayer Ceramic Capacitors 4.7μF ±10% 16V X7R SMD 0805", Capacitance=4.7uF, Case Code (Imperial)=0805, Case Code (Metric)=2012, Dielectric=X7R, Dielectric Material=Ceramic, Max Operating Temperature=125°C, Min Operating Temperature=-55°C, Package Quantity=1, Tolerance=10%, Voltage Rating=16V, Case/Package=0805, Construction=Flat, Depth=1.25mm, Height=1.25mm, Lead Free="Lead Free", Length=2mm, Mount="Surface Mount", Number of Pins=2, Packaging="Tape and Reel", Radiation Hardening=No, REACH SVHC="No SVHC", Resistor Type=Ceramic, RoHS Compliant=Yes, Series=C, Termination=SMD/SMT, Thickness=0.057inch, Voltage Rating (DC)=16V, Weight=0.000194oz, Width=0.049inch
C303: "Description", Manufacturer_Name=TDK, Copyright="Copyright (C) 2025 Ultra Librarian. All rights reserved.", Manufacturer_Part_Number=B32774D4106K000
C401 C608 C610: library part CMP-2000-06026-2, "Multilayer Ceramic Capacitors 10nF ±10% 50V X7R SMD 0603", Capacitance=10nF, Case Code (Imperial)=0603, Case Code (Metric)=1608, Dielectric=X7R, Dielectric Material=Ceramic, Max Operating Temperature=125°C, Min Operating Temperature=-55°C, Package Quantity=1, Tolerance=10%, Voltage=50V, Case/Package=0603, Construction=Flat, Depth=0.8mm, Height=0.8mm, Lead Free="Lead Free", Length=1.6mm, Mount="Surface Mount", Packaging="Tape and Reel", Radiation Hardening=No, REACH SVHC="No SVHC", Resistor Type=Ceramic, RoHS Compliant=Yes, Series=C, Termination=SMD/SMT, Thickness=0.037inch, Voltage Rating=50V, Voltage Rating (DC)=50V, Weight=7.1E-05oz, Width=0.031inch
C611: library part CMP-13271-002975-1, "CL21 Series 0805 10uF 25V ±10% Tolerance X5R Multilayer Ceramic Chip Capacitor", Capacitance=10uF, Case Code (Imperial)=0805, Case Code (Metric)=2012, Dielectric=X5R, Max Operating Temperature=85°C, Min Operating Temperature=-55°C, Package Quantity=1, Tolerance=10%, Voltage Rating=25V, Case/Package=0805, Depth=1.25mm, Height=1.25mm, Length=2mm, Mount="Surface Mount", Packaging="Tape and Reel", Radiation Hardening=No, Thickness=0.057inch, Width=0.049inch
D101: "Blue 10mm THT LED"
D401 D402 D602: library part CMP-2000-04932-2, "Fast Switching Diode, 100 V, 0.15 A, -65 to 150 degC, 2-Pin?SOD123, RoHS, Tape and Reel", If - Forward Current=0.15A, Ir - Reverse Current=1uA, Manufacturer=DiodesIncorporated, Max Surge Current=2A, Maximum Operating Temperature=+150C, Minimum Operating Temperature=-65C, Operating Temperature Range=-65Cto+150C, Package / Case=SOD-123, Package Reference=SOD123-2, Peak Reverse Voltage=100V, Vf - Forward Voltage=1.25V, Brand=DiodesIncorporated, Configuration=Single, Datasheet URL=http://www.farnell.com/datasheets/1915529.pdf, Datasheet Version="Rev. 24-2, 10/2013", Factory Pack Quantity=3000, Height=1.25mm, Length=2.85mm, Manufacturer URL=http://www.diodes.com/, Mounting Style=SMD/SMT, Package URL=http://www.diodes.com/datasheets/ds18004.pdf, Packaging=Reel, Product=SwitchingDiodes, Product Category=Diodes-GeneralPurpose,Power,Switching, Recovery Time=4ns, RoHS=True, Series=1N4148, Type=SwitchingDiode, Unit Weight=0.000353oz, Width=1.7mm
J101: library part CMP-1755-00004-1, "Male Header, Pitch 2 mm, 1 x 2 Position, Height 4.8 mm, Tail Length 3.4 mm, -25 to 85 degC, RoHS, Bulk", Capacitance="10 uF", Case\Package=Radial, Max Operating Temperature="85 degC", Min Operating Temperature="-40 degC", Package Quantity=200, Tolerance=20%, Voltage Rating="50 V", ComponentLink1Description=Datasheet, ComponentLink1URL=http://www.jst-mfg.com/product/pdf/eng/ePH.pdf, DatasheetVersion=Dec-12, Diameter="5 mm", Height="11 mm", Lead Pitch="2 mm", Length="11 mm", Mount="Through Hole", PackageDescription="Male Header, Pitch 2 mm, 1 x 2 Position, Height 4.8 mm, Tail Length 3.4 mm", PackageReference=S2B-PH-K-S, Packaging=Bulk, Pins=2, Radiation Hardening=No, REACH SVHC="No SVHC", RoHSCompliant=true, Voltage Rating (DC)="50 V"
J102 J201 J202 J401: library part CMP-17439-000039-1, "CONN HEADER R/A 3POS 2MM", Height=0.31inch, Length=0.31inch, Weight=0.0625lb, Width=0.31inch
J103: library part CMP-17439-000161-1, "CONN HEADER R/A 8POS 2MM", Color=White, Contact Resistance=20mR, Current Rating=2A, Flammability Rating="UL94 V-0", Insulation Color=Natural, Insulation Resistance=1GR, Max Operating Temperature=85°C, Max Voltage Rating (AC)=100V, Min Operating Temperature=-25°C, Connector Type=Header, Contact Finish - Mating=TIN, Contact Material=Brass, Contact Mating Length=0.13inch, Contact Plating=Tin, Contact Shape=Square, Contact Type="Male Pin", Depth=7.6mm, Fastening Type=Detent, Gender=Male, Height=9.4mm, Housing Color=White, Housing Material=Polyamide, Insulation Material=Nylon, Lead Free="Lead Free", Lead Pitch=2mm, Length=17.9mm, Max Current Rating=2A, Mount="Through Hole", Number of Contacts=8, Number of Pins=8, Number of Poles=8, Number of Positions=8, Number of Rows=1, Orientation="Right Angle", Packaging=Bulk, Pitch=2mm, REACH SVHC="No SVHC", Series=PH, Termination=Solder, Voltage Rating=100V, Voltage Rating (AC)=100V, Width=4.5mm, Working Voltage=100V
J301: library part CMP-1502-01068-4, "THT Vertical Pin Header WR-PHD, Pitch 2.54 mm, Single Row, 5 pins", Color=Black, Contact Resistance=20mΩ, Current Rating=3A, Max Operating Temperature=105°C, Min Operating Temperature=-40°C, Operating Supply Voltage=250V, Connector Type="Male Pin", Contact Material=Gold, Contact Mating Length=5.9944mm, Contact Plating=Gold, Gender=Male, Height=8.89mm, Lead Free="Lead Free", Lead Pitch=2.54mm, Mount="Through Hole", Number of Contacts=5, Number of Pins=5, Number of Positions=5, Number of Rows=1, Orientation=Vertical, Packaging=Bulk, Pitch=2.54mm, RoHS=Compliant, Termination=Solder, Voltage Rating=250V
Q101 Q601: library part CMP-2000-04930-2, Case/Package=SOT-23, Continuous Drain Current (ID)=200mA, Current=2A, Drain to Source Breakdown Voltage=50V, Drain to Source Resistance=1.4Ω, Gate to Source Voltage (Vgs)=20V, Input Capacitance=50pF, Max Junction Temperature (Tj)=150°C, Max Power Dissipation=300mW, Min Operating Temperature=-55°C, Resistance=3.5Ω, Threshold Voltage=1.2V, Contact Plating=Tin, Current Rating=200mA, Drain to Source Voltage (Vdss)=50V, Element Configuration=Single, Fall Time=25ns, Height=1.15mm, Lead Free="Lead Free", Length=2.9mm, Max Operating Temperature=150°C, Mount="Surface Mount", NexarPartId=335900, Nominal Vgs=1.2V, Number of Channels=1, Number of Elements=1, Number of Pins=3, Packaging="Cut Tape", Power Dissipation=300mW, Rds On Max=3.5Ω, REACH SVHC="No SVHC", Rise Time=10ns, RoHS=Compliant, Schedule B="8541210080, 8541210080", Turn-Off Delay Time=20ns, Turn-On Delay Time=20ns, Voltage=50V, Voltage Rating (DC)=50V, Weight=7.994566mg, Width=1.3mm
R101 R102 R203 R204 R401 R403 R601 R603: library part CMP-2100-03664-2, "RES 10K OHM 1% 1/10W 0603", Case Code (Imperial)=0603, Case Code (Metric)=1608, Max Operating Temperature=155°C, Max Power Dissipation=100mW, Min Operating Temperature=-55°C, Resistance=10kR, Resistance Tolerance=1%, Resistor Type="Thick Film", Temperature Coefficient=100ppm/°C, Voltage Rating=75V, Voltage Rating (DC)=50V, Case/Package=0603, Construction=Rectangular, Depth=0.8mm, Features="Moisture Resistant", Height=0.45mm, Lead Free="Lead Free", Lead Pitch=0.3mm, Length=1.6mm, Military Standard=Not, Number of Pins=2, Number of Terminations=2, Packaging="Tape and Reel", Power Rating=100mW, RoHS Compliant=Yes, Series=RC, Size Code=0603, Termination=SMD/SMT, Tolerance=1%, Weight=7.1E-05oz, Width=0.8mm
R103 R104 R105 R106 R606: library part CMP-2001-00044-1, Manufacturer=Panasonic, Part Number=ERJ6ENF2200V
R107 R605: library part CMP-2100-03662-2, "RES SMD 100K OHM 1% 1/10W 0603", Case Code (Imperial)=0603, Case Code (Metric)=1608, Max Operating Temperature=155°C, Max Power Dissipation=100mW, Min Operating Temperature=-55°C, Resistance=100kR, Resistance Tolerance=1%, Resistor Type="Thick Film", Temperature Coefficient=100ppm/°C, Voltage Rating=50V, Working Voltage=75V, Case/Package=0603, Construction=Rectangular, Depth=0.8mm, Features="Moisture Resistant", Height=0.45mm, Lead Free="Lead Free", Length=1.6mm, Military Standard=Not, Number of Pins=2, Number of Terminations=2, Packaging="Tape and Reel", Power Rating=100mW, REACH SVHC="No SVHC", RoHS Compliant=Yes, Series=RC, Technology="THICK FILM", Termination=SMD/SMT, Tolerance=1%, Voltage Rating (DC)=50V, Width=0.8mm
R201 R202 R402: library part CMP-1659-00056-1, "Chip Resistor, 1 MOhm, +/- 1%, 100 mW, -55 to 155 degC, 0603 (1608 Metric), RoHS, Tape and Reel", Capacitance="1 mF", Case\Package=Radial, Max Operating Temperature="85 degC", Min Operating Temperature="-40 degC", Package Quantity=200, Tolerance=20%, Voltage Rating="25 V", ComponentLink1Description="Manufacturer URL", ComponentLink1URL=http://www.yageo.com/, ComponentLink2Description=Datasheet, ComponentLink2URL=http://www.yageo.com/documents/recent/PYu-RC_Group_51_RoHS_L_04.pdf, DatasheetVersion="Rev. 4, 02/2016", Diameter="10 mm", Height="20 mm", Lead Pitch="5 mm", Length="20 mm", Mount="Through Hole", PackageDescription="2-Pin Surface Mount Device, Body 1.6 x 0.8 mm", PackageReference=0603, Packaging=Bulk, Radiation Hardening=No, REACH SVHC="No SVHC", RoHSCompliant=true, Voltage Rating (DC)="25 V", Width="0 inch"
R301: library part CMP-1659-00009-5, "RES 1K OHM 1% 1/10W 0603", Case Code (Imperial)=0603, Case Code (Metric)=1608, Max Operating Temperature=155°C, Max Power Dissipation=100mW, Min Operating Temperature=-55°C, Resistance=1kR, Resistance Tolerance=1%, Resistor Type="Thick Film", Temperature Coefficient=100ppm/°C, Voltage Rating=50V, Case/Package=0603, Construction=Rectangular, Contact Plating=Tin, Depth=0.8mm, Features="Moisture Resistant", Height=0.45mm, Lead Free="Lead Free", Length=1.6mm, Military Standard=Not, Number of Terminations=2, Packaging="Tape and Reel", Power Rating=100mW, Radiation Hardening=No, REACH SVHC="No SVHC", RoHS Compliant=Yes, Series=RC, Size Code=0603, Technology="THICK FILM", Termination=SMD/SMT, Tolerance=1%
R302 R304 R306 R308: library part CMP-03412-000619-1, "RES 10.0K OHM 1/10W .1% SMD 0603", Manufacturer=Yageo, Package=RT0603, Power Rating=0.1W, Resistance=10KΩ, Temperature="-55°C to +155°C", Temperature Coefficient="25 ppm/°C", Temperature Range High=+155°C, Temperature Range Low=-55°C, Tolerance=0.001, Voltage Rating=75V, Automotive=No, Category=Res, ComponentLink2Description=Datasheet, ComponentLink2URL=http://www.yageo.com/documents/recent/PYu-RT_1-to-0.01_RoHS_L_9.pdf, Composition="Thin Film", Device Class L1="Passive Components", Device Class L2=Resistors, Device Class L3="Chip SMD Resistors", Digikey Description="RES 10.0K OHM 1/10W .1% SMD 0603", Footprint Url=http://www.yageo.com/exep/pages/download/literatures/PYu-R_Mount_10.pdf, Height=0.55mm, Ipc Land Pattern Name=RESC16080X45, Lead Free=Yes, Manufacturer Part Number=RT0603BRD0710KL, Mouser Description="Thin Film Resistors - SMD 10K ohm 0.1% 1/10W", Octopart=https://octopart.com/rt0603brd0710kl-yageo-1399221, RoHS=TRUE, Series=RT
R303 R305 R307 R309: library part CMP-2000-04343-2, "RES 100K OHM 1/10W .1% SMD 0603", Manufacturer=Yageo, Package=RT0603, Power Rating=0.1W, Resistance=100KΩ, Temperature="-55°C to +155°C", Temperature Coefficient="25 ppm/°C", Temperature Range High=+155°C, Temperature Range Low=-55°C, Tolerance=0.001, Voltage Rating=75V, Automotive=No, Category=Res, ComponentLink2Description=Datasheet, ComponentLink2URL=http://www.yageo.com/documents/recent/PYu-RT_1-to-0.01_RoHS_L_9.pdf, Composition="Thin Film", Device Class L1="Passive Components", Device Class L2=Resistors, Device Class L3="Chip SMD Resistors", Digikey Description="RES 100K OHM 1/10W .1% SMD 0603", Footprint Url=http://www.yageo.com/exep/pages/download/literatures/PYu-R_Mount_10.pdf, Height=0.55mm, Ipc Land Pattern Name=RESC16080X45, Lead Free=Yes, Manufacturer Part Number=RT0603BRD07100KL, Mouser Description="Resistor; Resistance: 100Kohm; Resistance Tolerance: ± 1%; Resistor Element Material:", Octopart=https://octopart.com/rt0603brd07100kl-yageo-1402588, RoHS=TRUE, Series=RT
R602: library part CMP-1012-00896-1, "2M7 0.1W 1% 0603 (1608 Metric)  SMD", Case-EIA=0603, Case-Metric=1608, Power="0.1 W", Tolerance="1 %", Technology=SMT
R604: library part CMP-2000-03560-1, Manufacturer="Vishay Dale", Part Number=CRCW0603715KFKEA
R607: library part CMP-2000-06934-1, "Thick Film Resistor, 2.2 KOhm, 100 mW, 50 V, +/- 1%, -55 to 155 degC, 2-Pin SMD (0603), RoHS, Tape and Reel", Case Code - in=0603, Case Code - mm=1608, Manufacturer=Yageo, Operating Temperature Range=-55Cto+155C, Package Description="2-Pin Surface Mount Device, Body 1.6 x 0.8 mm", Power Rating=100mW, Resistance=2.2kOhms, Temperature Coefficient=100PPM/C, Tolerance=1%, Voltage Rating=50V, Datasheet URL=http://www.yageo.com/documents/recent/PYu-RC_Group_51_RoHS_L_7.pdf, Datasheet Version="Rev. 7, 05/2017", Manufacturer URL=http://www.yageo.com/, Mounting Technology=SurfaceMount, Package Reference=0603, Packaging=Reel, Product=ThickFilmResistorsGeneralPurpose, Series=RC, Termination Style=SMD/SMT
RV201 RV301 RV401: library part CMP-1747-00001-8, "TRIMMER 10K OHM 0.5W PC PIN TOP", Color=Blue, Insulation Resistance=1GR, Max Operating Temperature=125°C, Max Power Dissipation=500mW, Min Operating Temperature=-55°C, Package Quantity=50, Resistance=10kR, Resistance Tolerance=10%, Resistor Type=Cermet, Temperature Coefficient=100ppm/°C, Contact Plating=Tin, Depth=4.83mm, Height=11.55mm, Lead Free="Lead Free", Length=9.53mm, Military Standard=Not, Mount="Through Hole", Number of Turns=25, Packaging=Rail/Tube, Power Rating=500mW, Radiation Hardening=No, Reach SVHC Compliant=Yes, RoHS Compliant=Yes, Series=3296, Taper=Linear, Technology=CERMET, Termination=Pin, Tolerance=10%, Weight=0.03oz, Width=9.53mm
U101: library part CMP-0394-01056-3, "IC REG LINEAR 3.3V 200MA SOT23-5", Case/Package=TSOT, Dropout Voltage=175mV, Max Input Voltage=5.5V, Max Operating Temperature=125°C, Max Output Current=200mA, Max Output Voltage=3.3V, Max Power Dissipation=500mW, Min Current Limit=220mA, Min Input Voltage=2V, Min Operating Temperature=-40°C, Output Voltage Accuracy=2%, Package Quantity=1, Quiescent Current=30uA, Accuracy=2%, Lead Free="Lead Free", Min Output Voltage=3.3V, Nominal Output Voltage=3.3V, Number of Outputs=1, Number of Pins=5, Number of Regulators=1, Output Current=200mA, Output Type=Fixed, Output Voltage=3.3V, Packaging="Tape and Reel", Polarity=Positive, Power Dissipation=500mW, Radiation Hardening=No, REACH SVHC="No SVHC"
U201 U303 U401: library part CMP-04896-000095-1, "IC COMPARATOR RRI DUAL 8SOIC", Case/Package=SOIC, Input Bias Current=50pA, Input Offset Voltage (Vos)=5mV, Max Operating Temperature=125°C, Max Supply Current=40uA, Max Supply Voltage=5.5V, Min Operating Temperature=-40°C, Min Supply Voltage=2.7V, Nominal Supply Current=50uA, Package Quantity=2500, Power Supply Rejection Ratio (PSRR)=85dB, Common Mode Rejection Ratio=70dB, Contact Plating=Gold, Hysteresis=1.2mV, Lead Free="Lead Free", Max Input Current=50pA, Mount="Surface Mount", Number of Channels=2, Number of Elements=2, Number of Pins=8, Output Type=PUSH-PULL, Packaging="Tape and Reel", Propagation Delay=50ns, Quiescent Current=50uA, Radiation Hardening=No, Response Time=0.047us, RoHS Compliant=Yes, Series=TLV3202, Supply Current=50uA, Type="General Purpose"
U202: library part CMP-0859-00561-4, "IC DECODER/DEMUX 1 X 2:4 SM8", Case/Package=SSOP, High Level Output Current=-32mA, Low Level Output Current=32mA, Max Operating Temperature=85°C, Max Supply Voltage=5.5V, Min Operating Temperature=-40°C, Min Supply Voltage=1.65V, Package Quantity=3000, Quiescent Current=10uA, Contact Plating=Gold, Independent Circuits=1, Lead Free="Lead Free", Logic Function=Demultiplexer, Mount="Surface Mount", Number of Bits=1, Number of Circuits=1, Number of Elements=1, Number of Input Lines=2, Number of Inputs=2, Number of Output Lines=4, Number of Outputs=4, Number of Pins=8, Packaging="Tape and Reel", Polarity=Inverting, Propagation Delay=16.7ns, Radiation Hardening=No, REACH SVHC="No SVHC", Supply Type=Single, Throw Configuration=DP4T, Weight=0.000825oz
U301: library part CMP-04895-000120-1, "IC OPAMP GP 4 CIRCUIT 14SOIC", Case/Package=SOIC, Input Bias Current=20pA, Input Offset Voltage (Vos)=100uV, Max Operating Temperature=125°C, Min Operating Temperature=-40°C, Operating Supply Current=140uA, Gain Bandwidth Product=2.5MHz, Mount="Surface Mount", Number of Channels=4, Number of Circuits=4, Number of Pins=14, Packaging="Tape and Reel", RoHS Compliant=Yes, Slew Rate=7V/µs
U302: library part CMP-00370-99888634-1, "TMUX1101DBVR 3-pA on-state leakage current, 5-V, 1: 1 (SPST), 1-channel precision switch (active high) 5-SOT-23 -40 to 125", Case/Package=SOT-23, Manufacturer Lifecycle Status=ACTIVE, Resistance=4.9Ω, Height=1.45mm, Length=2.9mm, Lifecycle Status=Production, NexarPartId=99888634, Number of Channels=1, Number of Pins=5, Schedule B=8542390000, Thickness=1.2mm, Width=1.6mm
U304: library part CMP-0859-00550-4, "IC FF D-TYPE SNGL 1BIT SM8", Ambient Temperature Range High=+125°C, Ambient Temperature Range Low=-40°C, Frequency=200MHz, Manufacturer="Texas Instruments", Max Supply Voltage=5.5V, Min Supply Voltage=1.65V, Nominal Supply Current=10uA, Package=DCT0008A, Temperature="-40°C to +125°C", Automotive=No, Category=IC, ComponentLink2Description=Datasheet, ComponentLink2URL=http://www.ti.com/lit/ds/symlink/sn74lvc1g74.pdf, Device Class L1="Integrated Circuits (ICs)", Device Class L2="Logic ICs", Device Class L3="Latches and Flip Flops", Digikey Description="IC FF D-TYPE SNGL 1BIT SM8", Height=1.3mm, Ipc Land Pattern Name=SOP65P400X130-8, Lead Free=Yes, Logic Function Desc="D Type", Manufacturer Part Number=SN74LVC1G74DCTR, Mouser Description="Flip Flops Sgl Pos-Edge-Trggrd", Number of Circuits=1, Number of Inputs=1, Number of Outputs=2, Octopart=https://octopart.com/sn74lvc1g74dctr-texas+instruments-12194016, Propagation Delay=6.4ns, RoHS=TRUE, Standoff Height=0mm, Temperature Range High=+125°C, Temperature Range Low=-40°C
U305: library part CMP-0859-00527-3, "Dual 2-Input Positive-AND Gate, DCT0008A, LARGE T&R", F @ Nom Voltage(Max)(Mhz)=150, Generic Part Number=SN74LVC2G08, ICC @ Nom Voltage(Max)(mA)=0.01, Manufacturer="Texas Instruments", Operating Temperature Range(C)="-40 to 125,-40 to 85", Rating=Catalog, tpd @ Nom Voltage(Max)(ns)=9.8,5.8,5.3,4.8, Voltage(Nom)(V)=1.8,2.5,3.3,5, 3-State Output=No, Bits(#)=2, DatasheetVersion=SCES198M, Gate Type=AND, Input Type=CMOS/TTL, Logic=True, Output Drive (IOL/IOH)(Max)(mA)=32/-32, Output Type=CMOS, PackageReference=DCT0008A, Schmitt Trigger=No, Sub-Family="AND Gate", Technology Family=LVC, VCC(Max)(V)=5.5, VCC(Min)(V)=1.65
U306 U503: library part CMP-0859-00134-4, "IC INVERTER 1CH 1-INP SOT23-5", Case/Package=SOT-23, High Level Output Current=-32mA, Low Level Output Current=32mA, Max Operating Temperature=125°C, Max Supply Voltage=5.5V, Min Operating Temperature=-40°C, Min Supply Voltage=1.65V, Package Quantity=1, Quiescent Current=10uA, Contact Plating=Tin, Height=1.3mm, Lead Free="Lead Free", Length=3.05mm, Logic Function=Inverter, Max Output Current=32mA, Mount="Surface Mount", Number of Bits=1, Number of Circuits=1, Number of Elements=1, Number of Gates=1, Number of Inputs=1, Number of Pins=5, Output Current=32mA, Packaging="Tape and Reel", Propagation Delay=3.7ns, Radiation Hardening=No, REACH SVHC="No SVHC", Schmitt Trigger Input=No, Termination=SMD/SMT, Turn-On Delay Time=7.5ns, Weight=0.000557oz, Width=1.75mm
U501: library part CMP-04902-000018-1, "IC QUAD NAND R/S LATCH 16SOIC", Case/Package=SOIC, High Level Output Current=-4.2mA, Low Level Output Current=4.2mA, Max Operating Temperature=125°C, Max Supply Voltage=18V, Min Operating Temperature=-55°C, Min Supply Voltage=3V, Output Current=6.8mA, Package Quantity=1, Quiescent Current=20uA, Contact Plating=Gold, Independent Circuits=4, Lead Free="Lead Free", Logic Function=Latch, Mount="Surface Mount", Number of Bits=4, Number of Circuits=1, Number of Elements=1, Number of Input Lines=8, Number of Output Lines=4, Number of Pins=16, Output Type=3-STATE, Packaging="Tape and Reel", Polarity=Non-Inverting, Propagation Delay=300ns, Radiation Hardening=No, RoHS Compliant=Yes, Series=4000B, Technology=CMOS, Turn-On Delay Time=50ns, Weight=0.004998oz
U502: library part CMP-0777-00002-4, "IC GATE AND 3CH 3-INP 14SOIC", Case/Package=SOIC, High Level Output Current=-5.2mA, Low Level Output Current=5.2mA, Max Operating Temperature=85°C, Max Supply Voltage=6V, Min Operating Temperature=-40°C, Min Supply Voltage=2V, Operating Supply Voltage=5V, Output Current=25mA, Package Quantity=1, Quiescent Current=2uA, Contact Plating=Gold, Lead Free="Lead Free", Logic Function="AND GATE", Mount="Surface Mount", Number of Bits=3, Number of Circuits=3, Number of Elements=3, Number of Gates=3, Number of Input Lines=3, Number of Inputs=3, Number of Output Lines=1, Number of Outputs=1, Number of Pins=14, Packaging="Tape and Reel", Propagation Delay=17ns, Radiation Hardening=No, REACH SVHC="No SVHC", RoHS Compliant=Yes, Turn-On Delay Time=25ns, Weight=0.004318oz
U504: "CMOS Quad NOR R/S Latch with 3-State Outputs 16-SOIC -55 to 125", Manufacturer_Name="Texas Instruments", Copyright="Copyright (C) 2025 Ultra Librarian. All rights reserved.", Manufacturer_Part_Number=CD4043BDR, RefDes=RefDes, Type=Type
U601: library part CMP-1619-00964-2, "Octal D-Type Flip-Flops With Clear, PW0020A, LARGE T&R", F @ Nom Voltage(Max)(Mhz)=28, Generic Part Number=SN74HC273, ICC @ Nom Voltage(Max)(mA)=0.08, Manufacturer="Texas Instruments", Operating Temperature Range(C)="-40 to 85", Rating=Catalog, tpd @ Nom Voltage(Max)(ns)=34, Voltage(Nom)(V)=3.3,5, 3-State Output=No, Bits(#)=8, Code_JEDEC=MO-153, DatasheetVersion=SCLS136D, Input Type=CMOS, Output=2S, Output Drive (IOL/IOH)(Max)(mA)=5.2/-5.2, Output Logic=Non-inverted, Output Type=CMOS, PackageReference=PW0020A, Schmitt Trigger=No, Technology Family=HC, VCC(Max)(V)=6, VCC(Min)(V)=2
U602: library part CMP-1581-00122-3, "8-Bit Identity/Magnitude Comparators (P=Q) with Enable, PW0020A, LARGE T&R", F @ Nom Voltage(Max)(Mhz)=70, Generic Part Number=SN74HC688, ICC @ Nom Voltage(Max)(mA)=0.08, Manufacturer="Texas Instruments", Operating Temperature Range(C)="-40 to 85", Rating=Catalog, tpd @ Nom Voltage(Max)(ns)=45, Voltage(Nom)(V)=6, Bits(#)=8, DatasheetVersion=SCLS010D, Input Type=CMOS, Output Drive (IOL/IOH)(Max)(mA)=5.2/-5.2, Output Type=CMOS, PackageReference=PW0020A, Schmitt Trigger=No, Technology Family=HC, VCC(Max)(V)=6, VCC(Min)(V)=2
U603: library part CMP-0859-00033-4, "Single Schmitt-Trigger Buffer, DBV0005A, LARGE T&R", F @ Nom Voltage(Max)(Mhz)=150, Generic Part Number=SN74LVC1G17, ICC @ Nom Voltage(Max)(mA)=0.01, Manufacturer="Texas Instruments", Operating Temperature Range(C)="-40 to 125,-40 to 85", Rating=Catalog, tpd @ Nom Voltage(Max)(ns)=11,6.5,5.5,5, Voltage(Nom)(V)=1.8,2.5,3.3,5, 3-State Output=No, Bits(#)=1, DatasheetVersion=SCES351V, Input Type=CMOS/TTL, Logic=True, Output Drive (IOL/IOH)(Max)(mA)=32/-32, Output Type=CMOS, PackageReference=DBV0005A, Schmitt Trigger=Yes, Sub-Family="Non-Inverting Buffer/Driver", Technology Family=LVC, VCC(Max)(V)=5.5, VCC(Min)(V)=1.65
U604: library part CMP-0859-00113-4, "IC GATE NAND 1CH 2-INP SOT23-5", Ambient Temperature Range High=+125°C, Ambient Temperature Range Low=-40°C, Frequency=100MHz, Manufacturer="Texas Instruments", Max Supply Voltage=5.5V, Min Supply Voltage=1.65V, Nominal Supply Current=10uA, Package=DBV0005A, Temperature="-40°C to +125°C", Automotive=No, Category=IC, ComponentLink2Description=Datasheet, ComponentLink2URL=http://www.ti.com/lit/ds/symlink/sn74lvc1g00.pdf, Device Class L1="Integrated Circuits (ICs)", Device Class L2="Logic ICs", Device Class L3="Logic Gates", Digikey Description="IC GATE NAND 1CH 2-INP SOT23-5", Height=1.45mm, Ipc Land Pattern Name=SOT95P280X145-5, Lead Free=Yes, Logic Function Desc=Inverting, Manufacturer Part Number=SN74LVC1G00DBVR, Mouser Description="IC Mos 74LVC1G00/SO/SN74LVC1G00DBVR TEXAS INSTRUMENT RoHS LVC SOt23", Number of Circuits=1, Number of Inputs=2, Number of Outputs=1, Octopart=https://octopart.com/sn74lvc1g00dbvr-texas+instruments-465560, Propagation Delay=4.3ns, RoHS=TRUE, Standoff Height=0mm, Temperature Range High=+125°C, Temperature Range Low=-40°C
U605: "15V Dual LinCMOS timer 14-SOIC -40 to 85", Manufacturer_Name="Texas Instruments", Copyright="Copyright (C) 2026 Ultra Librarian. All rights reserved.", Datasheet=https://www.ti.com/lit/gpn/tlc556, Manufacturer_Part_Number=TLC556IDR, RefDes=RefDes, Type=Type

## Free pads (board coordinates)
  round 6 hole 3.2 unplated: MH1(5,5) MH2(95,5) MH3(95,95) MH4(5,95)

## Via types
v1: diameter 0.6, hole 0.3, Top Layer to Bottom Layer, 164 vias

## Nets (pads, with @x,y where several pads share a name; then routed paths per layer and width w, separated by ;. In a path a pad name is that pad's centre, name@x,y a point inside that pad or via, vN(x,y) a via of type N, cw(c..) or ccw(c..) an arc to the next point about the centre after c; other vN are vias at no path point)
+3V3_SENSOR: C102.1 C302.1 J301.1 U101.5 U401.6 | length 49.9
  Top Layer w0.5: J301.1@59.26,82.33 60.97,80.62 86.08,80.62 v1(86.8,79.9)
  Bottom Layer w0.5: U401.6@84.084,80.225 86.448,80.225 86.773,79.9 v1(86.8,79.9)
  Bottom Layer w0.6: U101.5@55.93,90.26 59.731,90.26 59.731,90.151 59.26,89.68 J301.1@59.26,82.33 59.3,82.29 65.79,82.29 C302.1@65.83,82.25